# Altium PCB Power_Board-V1.0.PcbDoc (part 1 of 4)
Units mm, origin at the board's own origin, x right, y up, seen from the top; angles counter-clockwise.
Board outline 64.6 x 83.5 mm, 4 copper layers (Top Layer, GND1, GND2, Bottom Layer), stack 0.603 mm thick; 188 components, 131 nets, 487 pads, 123 vias.
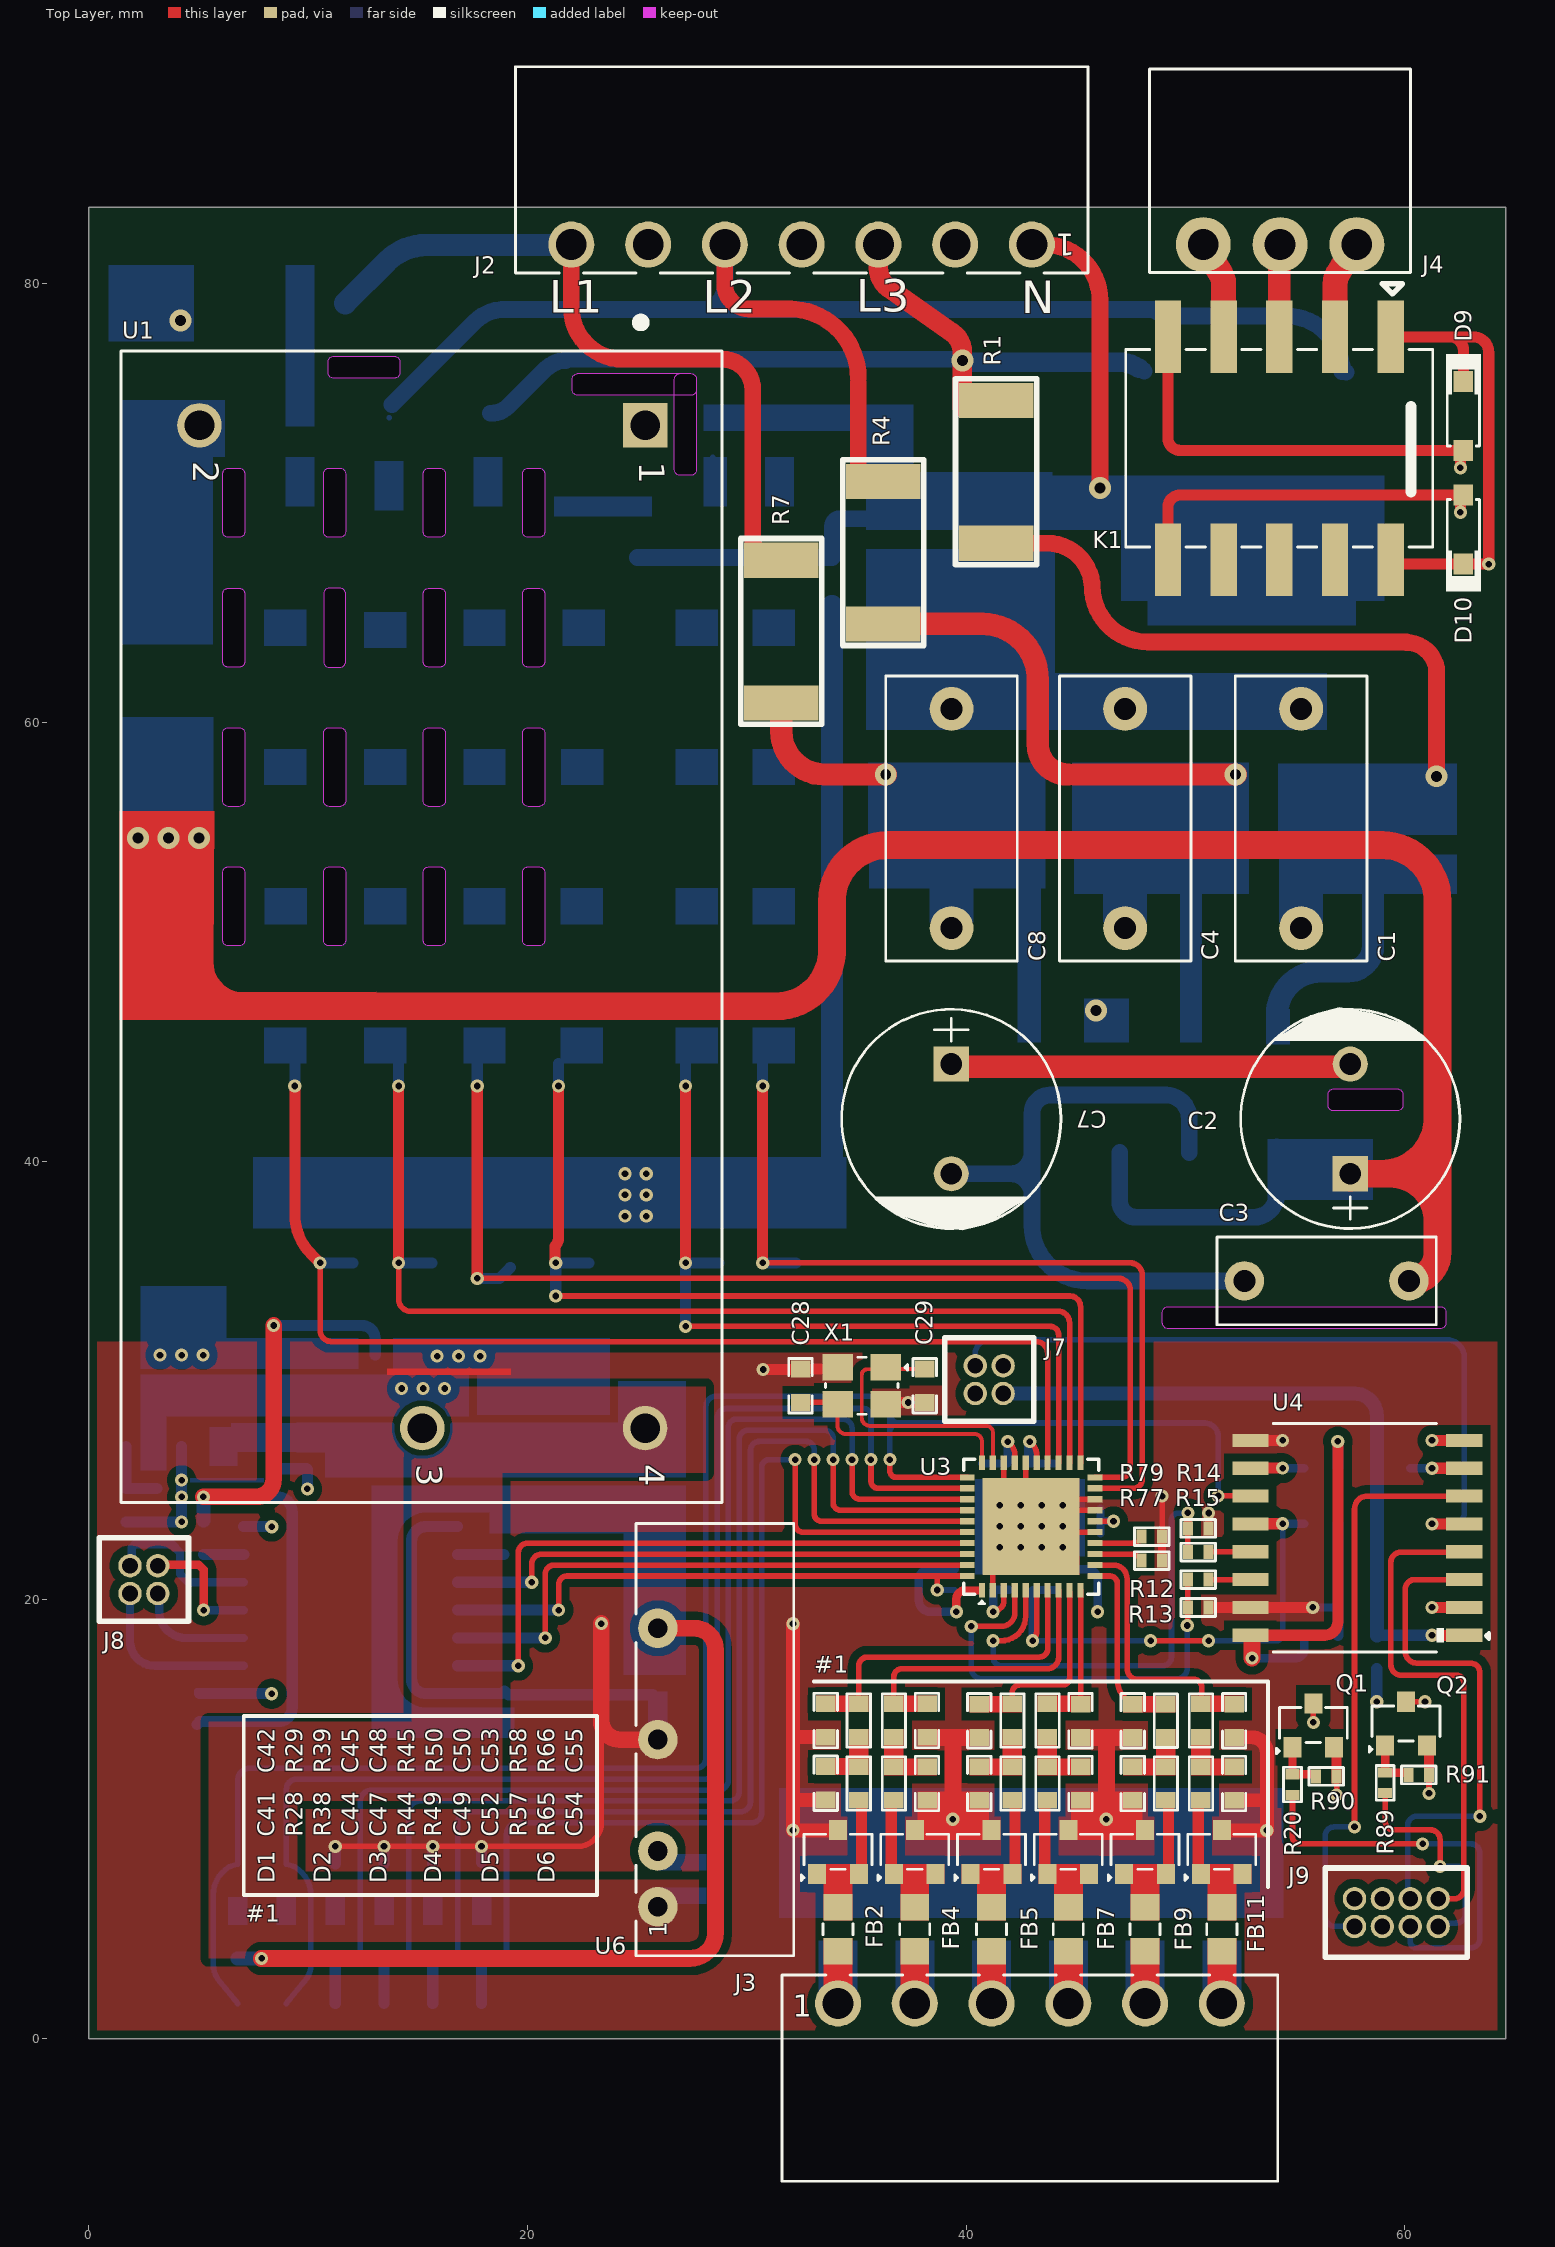
[diagram p0: Top Layer view]
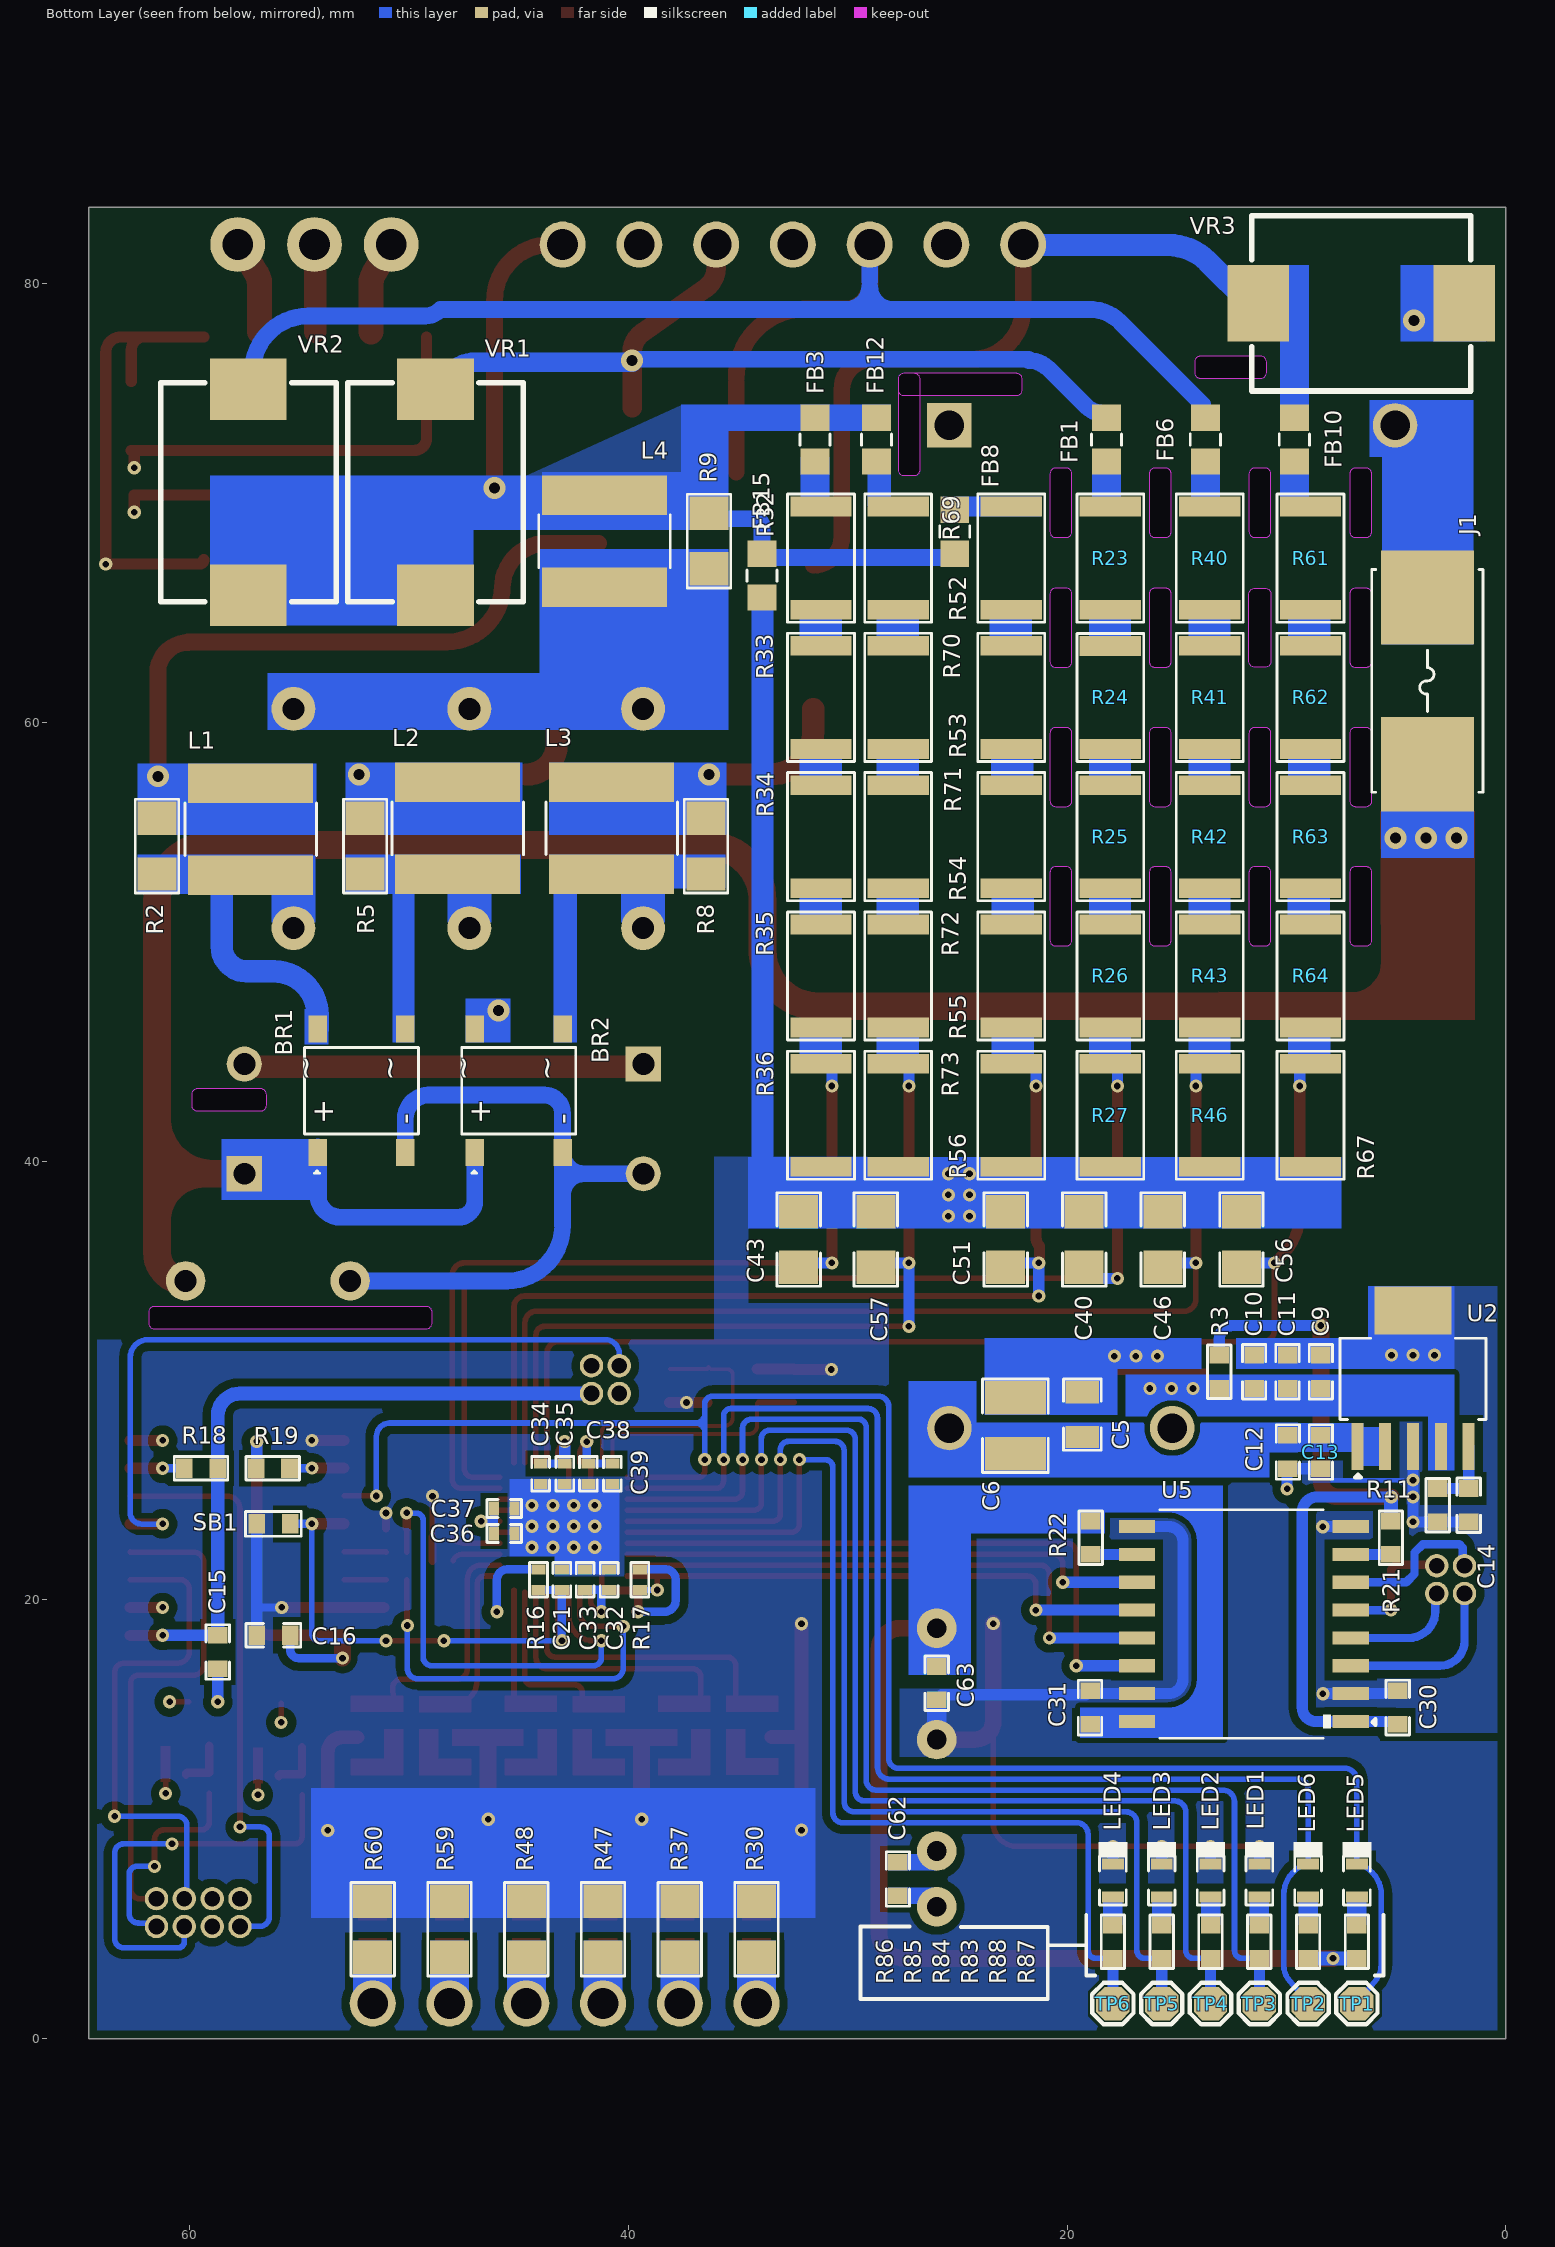
[diagram p1: Bottom Layer view, seen from below]
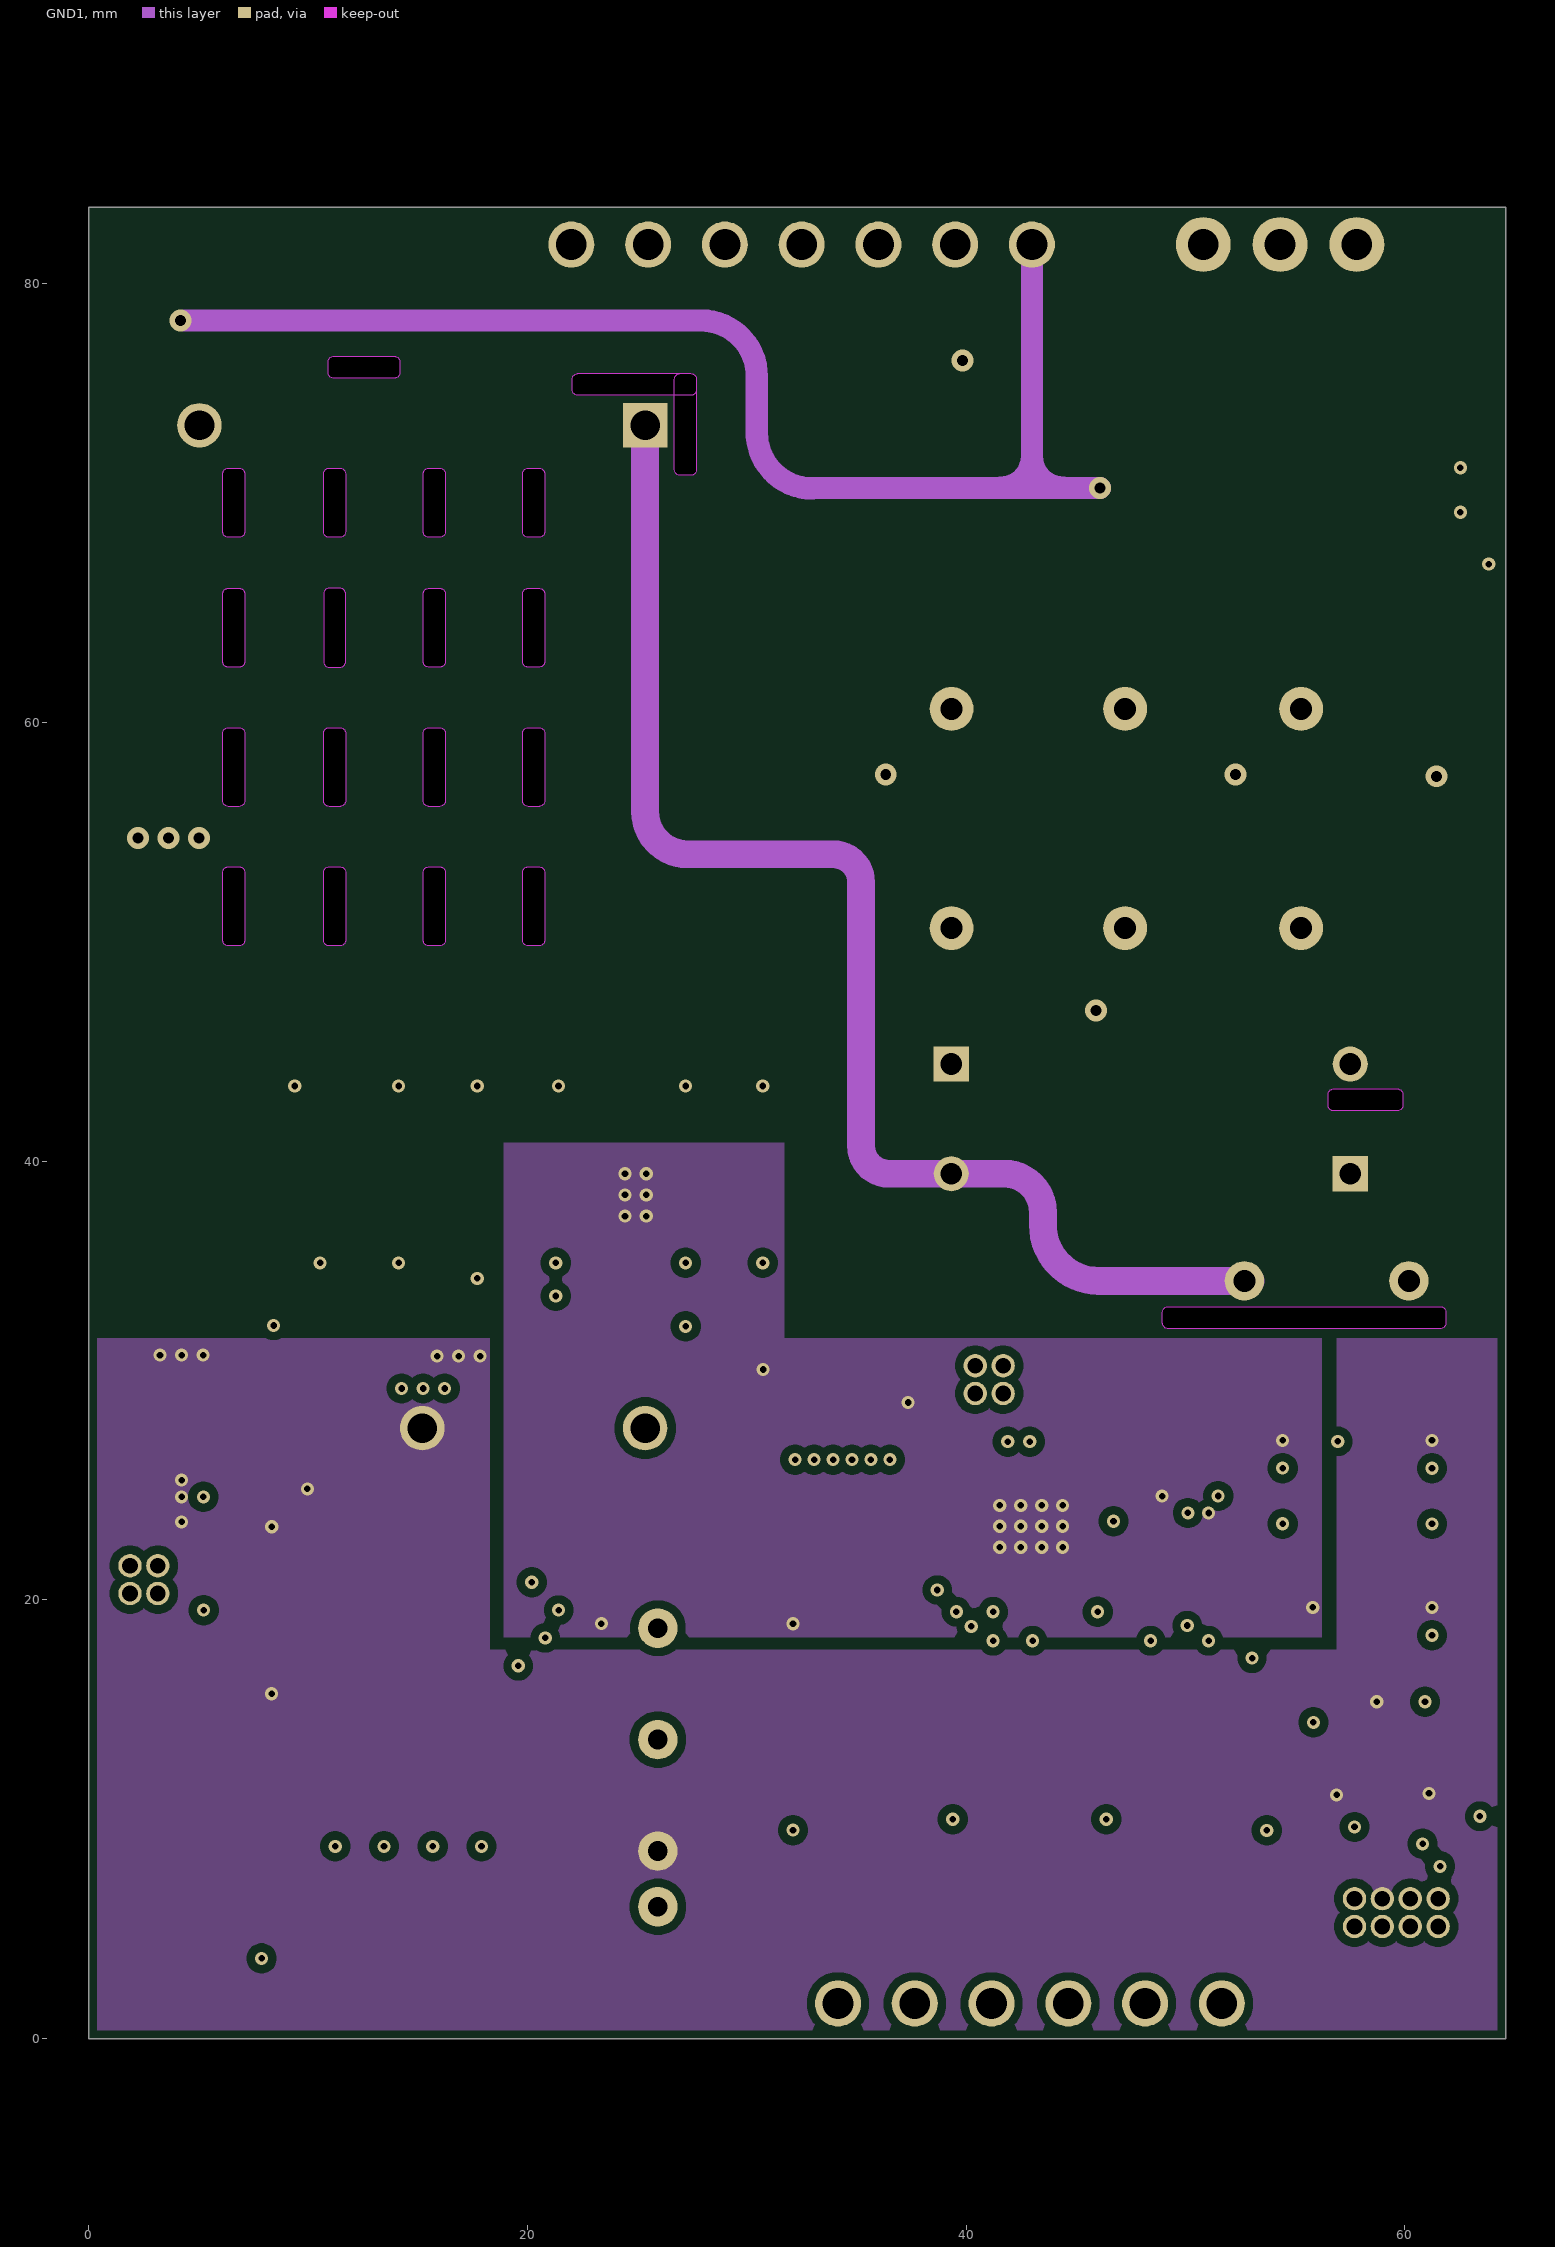
[diagram p2: GND1]
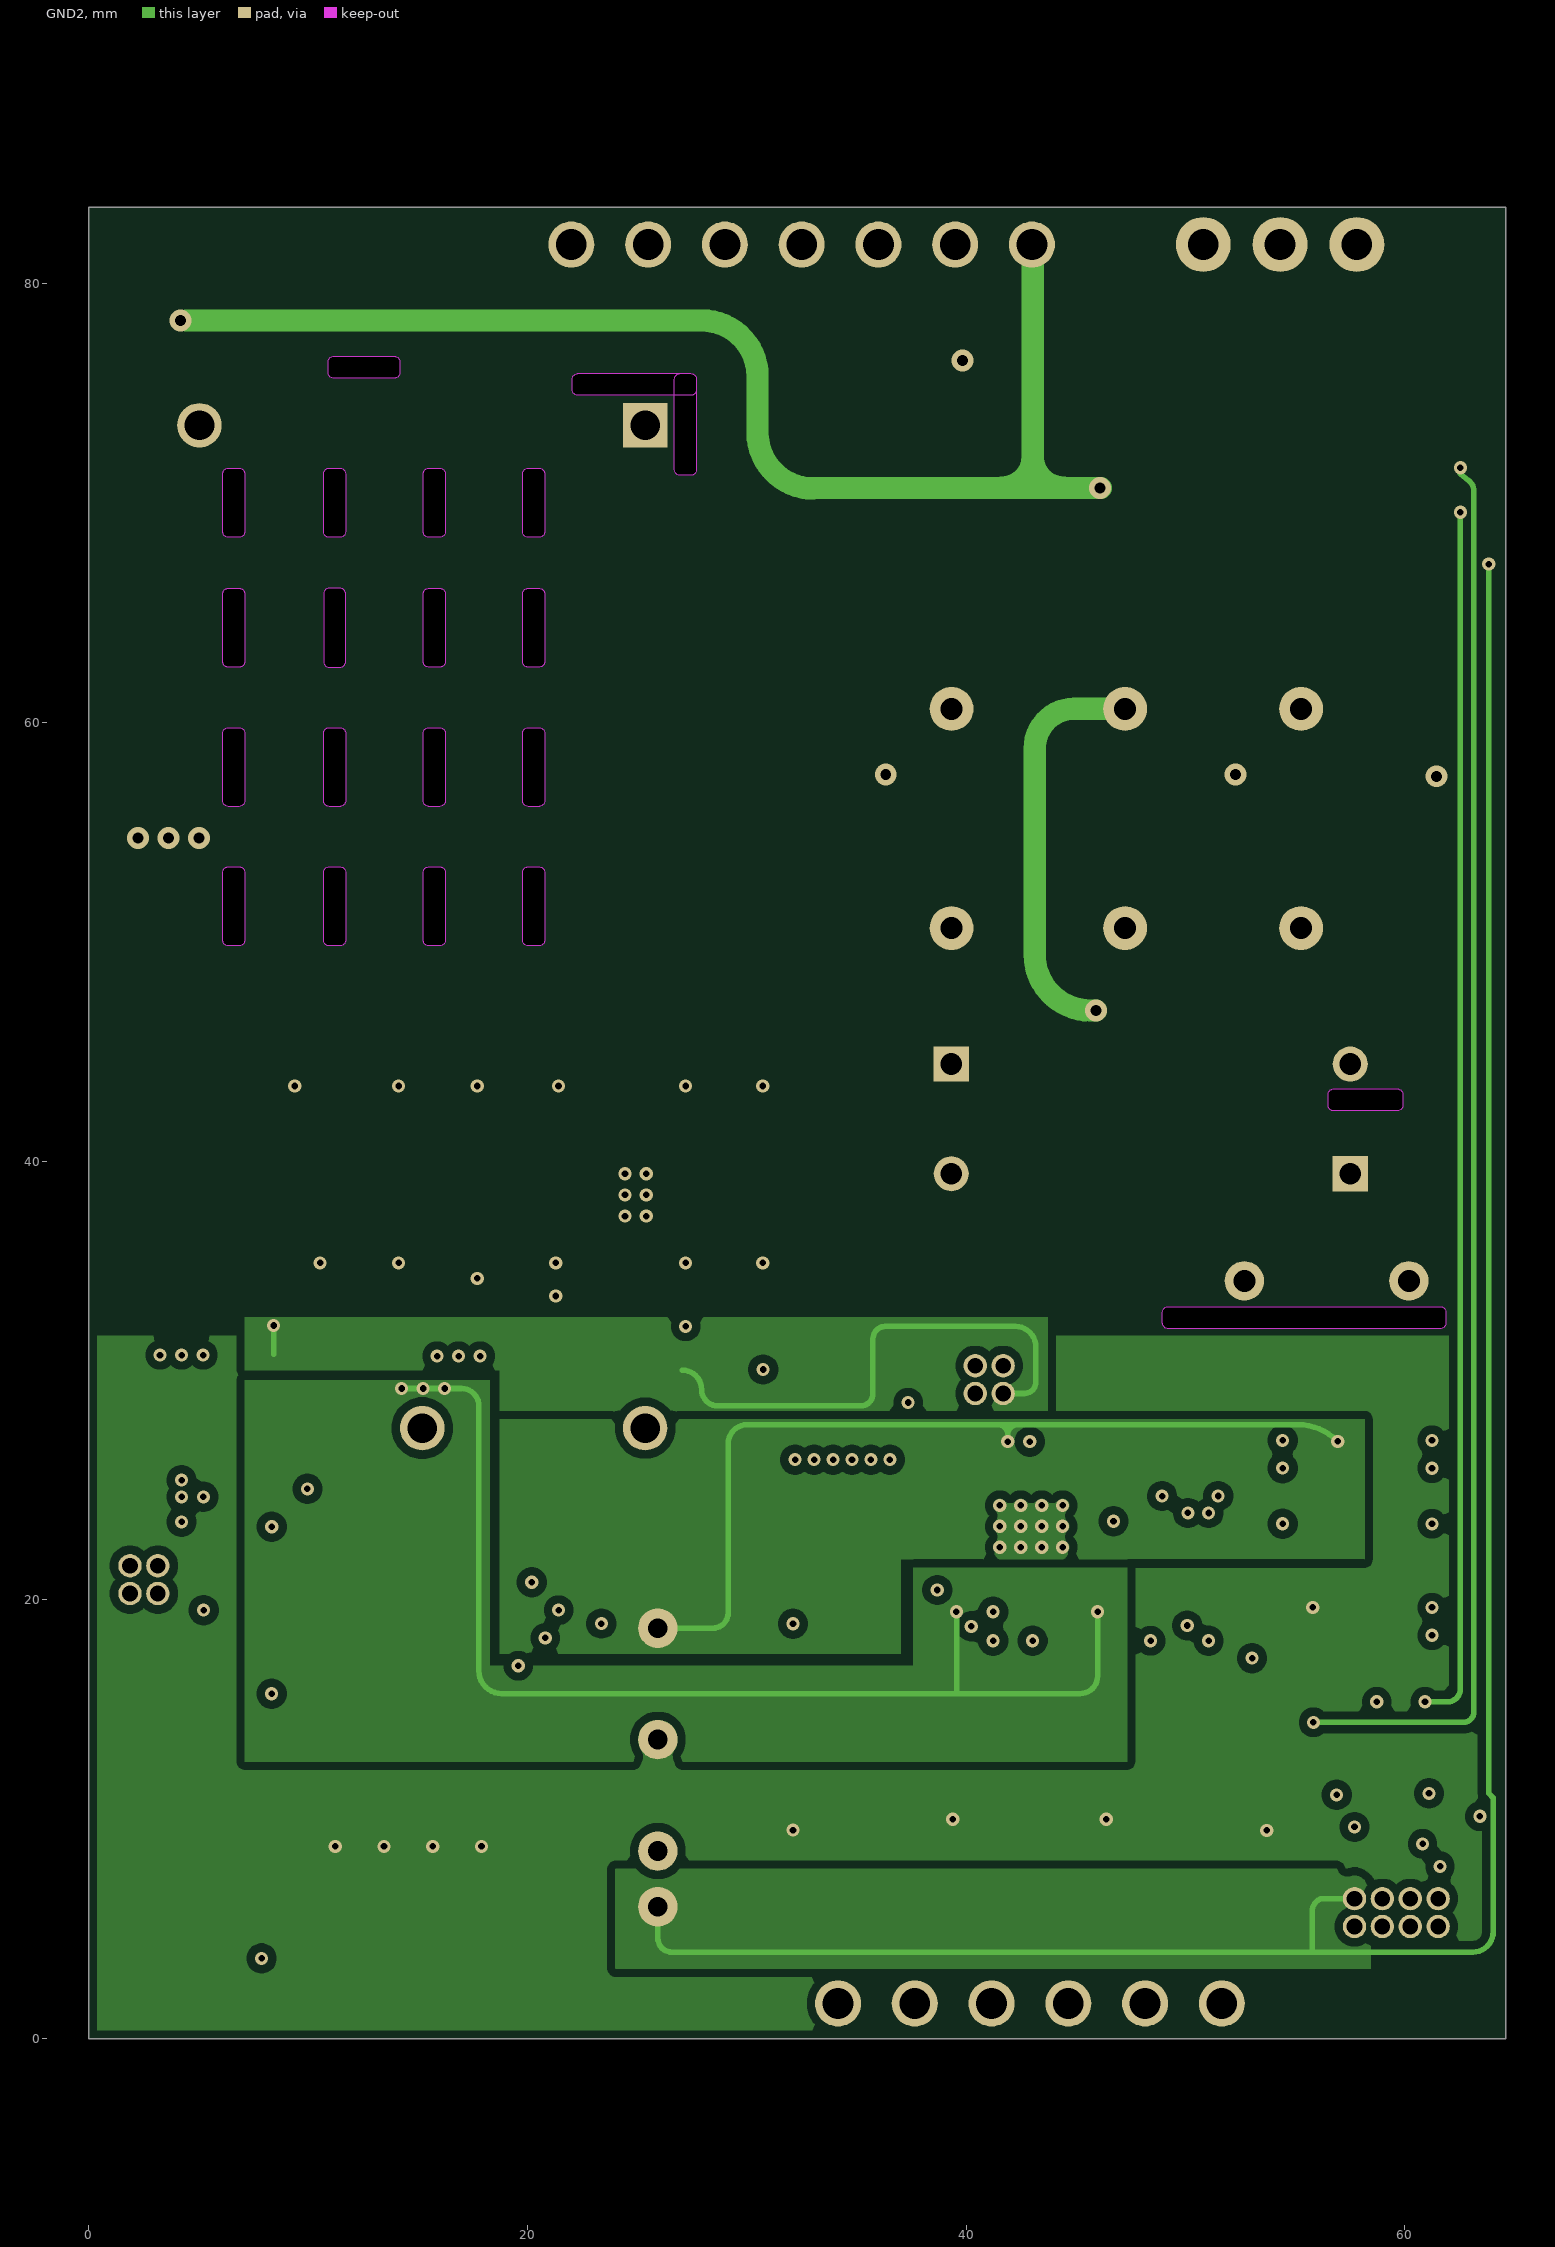
[diagram p3: GND2]
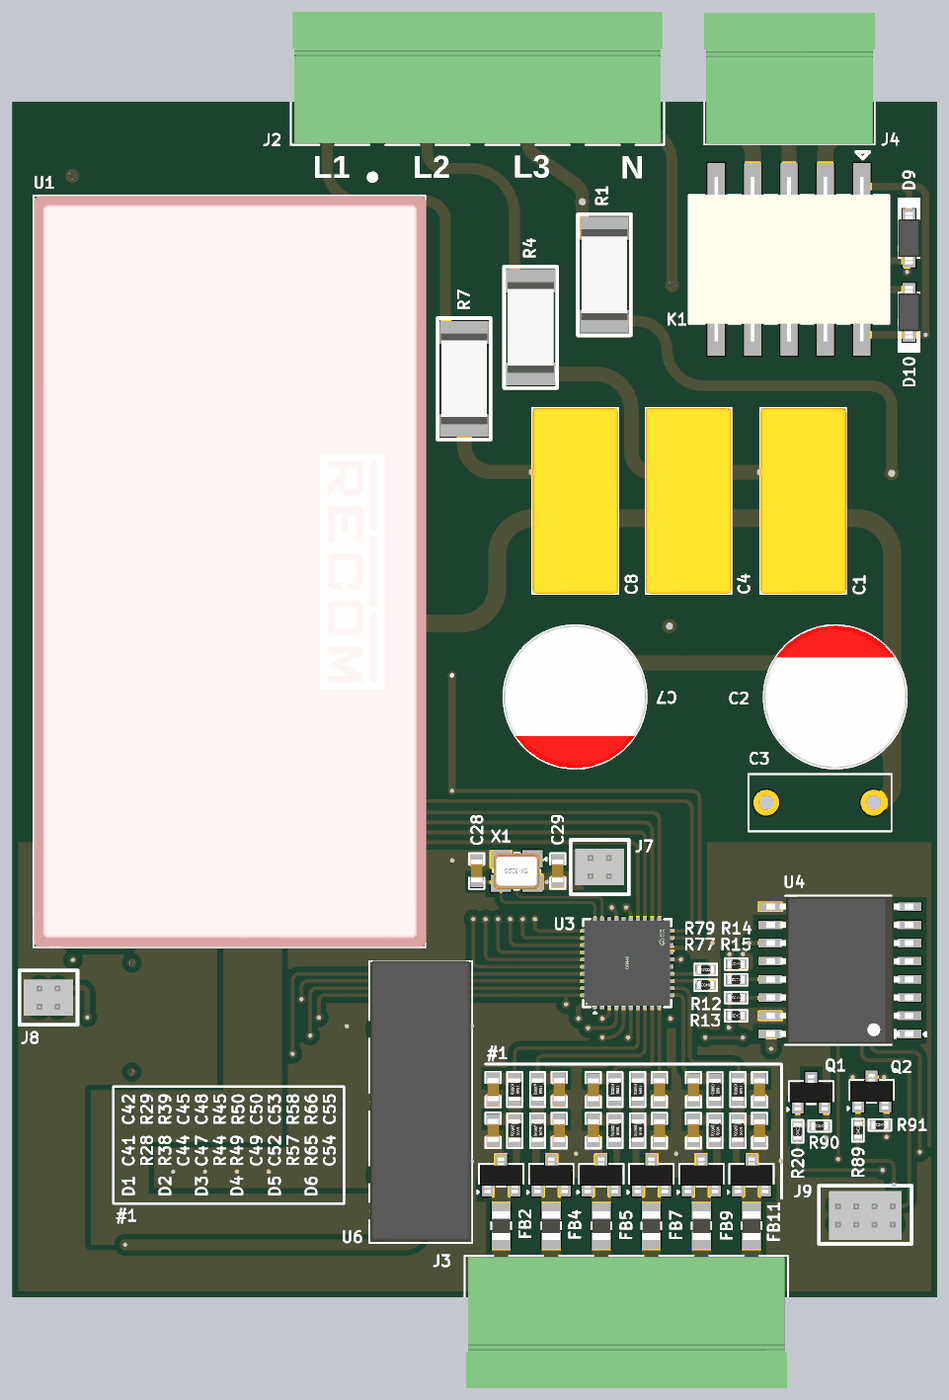
[diagram p5: 3D render of the assembled board from above, using the file's embedded part models]
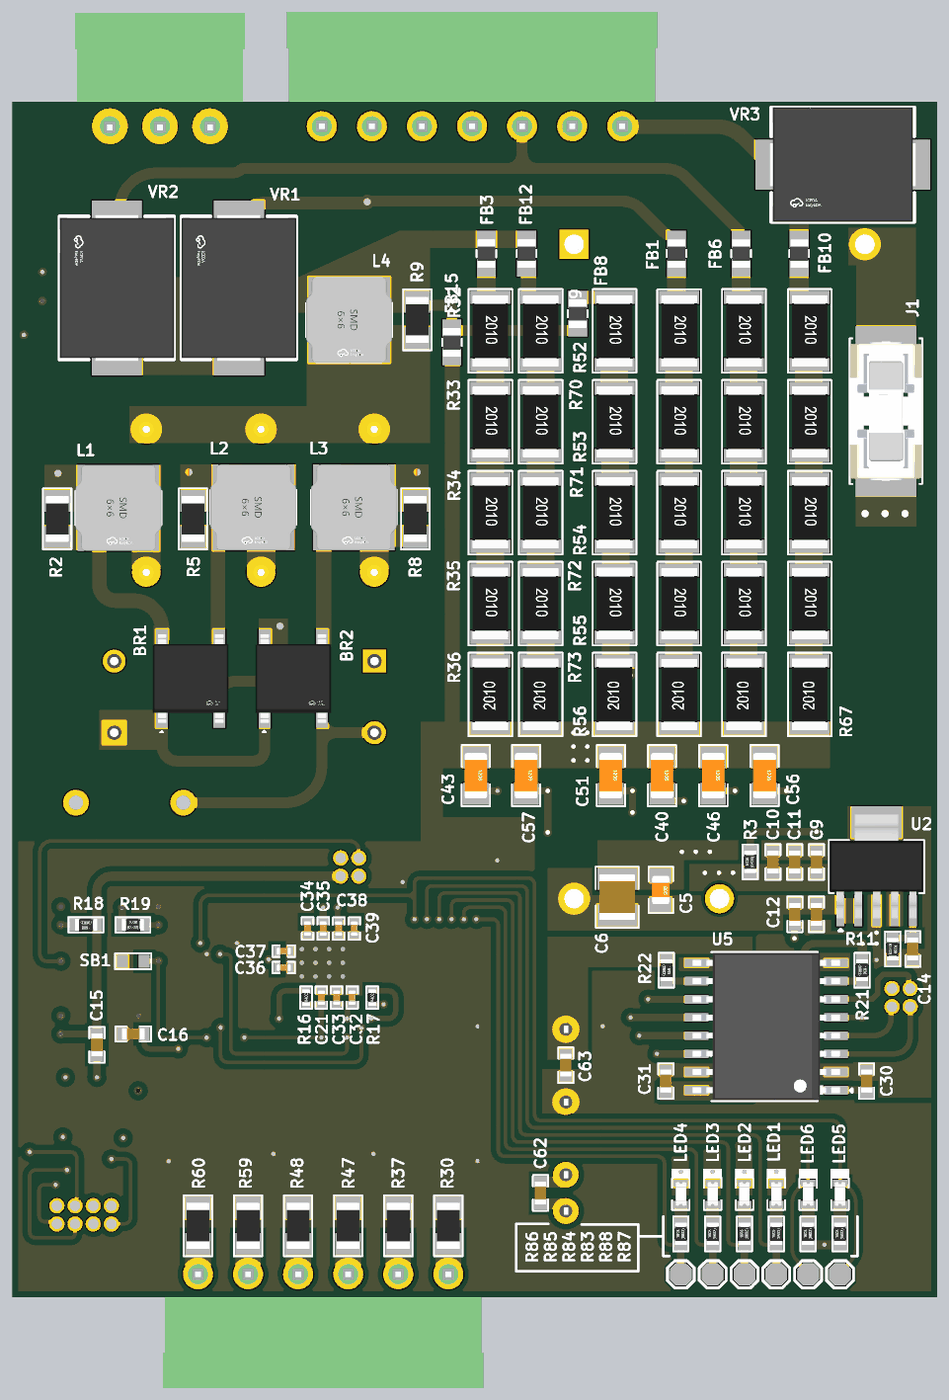
[diagram p6: 3D render of the assembled board from below, using the file's embedded part models]

## Layer stack, top to bottom
Top Solder: solder mask 0.0102, Solder Resist, Dk 3.5
Top Layer: signal copper 0.0356
Dielectric 2: prepreg 0.0711, PP-006, Dk 4.1
GND1: signal copper 0.035
Dielectric 1: dielectric 0.32, FR-4, Dk 4.8
GND2: signal copper 0.035
Dielectric 3: prepreg 0.0711, PP-006, Dk 4.1
Bottom Layer: signal copper 0.0356
Bottom Solder: solder mask 0.0102, Solder Resist, Dk 3.5

## Board outline
0,0 64.6,0 64.6,83.5 0,83.5
cut-out: 26.7,71.529 26.7,75.667 cw(c26.954,75.667) 26.954,75.921 27.446,75.921 cw(c27.446,75.667) 27.7,75.667 27.7,71.529 cw(c27.446,71.529) 27.446,71.275 26.954,71.275 cw(c26.954,71.529)
cut-out: 22.046,75.175 22.046,75.667 cw(c22.3,75.667) 22.3,75.921 27.446,75.921 cw(c27.446,75.667) 27.7,75.667 27.7,75.175 cw(c27.446,75.175) 27.446,74.921 22.3,74.921 cw(c22.3,75.175)
cut-out: 48.95,32.624 48.95,33.116 cw(c49.204,33.116) 49.204,33.37 61.621,33.37 cw(c61.621,33.116) 61.875,33.116 61.875,32.624 cw(c61.621,32.624) 61.621,32.37 49.204,32.37 cw(c49.204,32.624)
cut-out: 19.78,50.079 19.78,53.171 cw(c20.034,53.171) 20.034,53.425 20.526,53.425 cw(c20.526,53.171) 20.78,53.171 20.78,50.079 cw(c20.526,50.079) 20.526,49.825 20.034,49.825 cw(c20.034,50.079)
cut-out: 19.78,56.429 19.78,59.521 cw(c20.034,59.521) 20.034,59.775 20.526,59.775 cw(c20.526,59.521) 20.78,59.521 20.78,56.429 cw(c20.526,56.429) 20.526,56.175 20.034,56.175 cw(c20.034,56.429)
cut-out: 15.251,50.079 15.251,53.171 cw(c15.505,53.171) 15.505,53.425 15.997,53.425 cw(c15.997,53.171) 16.251,53.171 16.251,50.079 cw(c15.997,50.079) 15.997,49.825 15.505,49.825 cw(c15.505,50.079)
cut-out: 15.251,56.429 15.251,59.521 cw(c15.505,59.521) 15.505,59.775 15.997,59.775 cw(c15.997,59.521) 16.251,59.521 16.251,56.429 cw(c15.997,56.429) 15.997,56.175 15.505,56.175 cw(c15.505,56.429)
cut-out: 10.705,50.079 10.705,53.171 cw(c10.959,53.171) 10.959,53.425 11.451,53.425 cw(c11.451,53.171) 11.705,53.171 11.705,50.079 cw(c11.451,50.079) 11.451,49.825 10.959,49.825 cw(c10.959,50.079)
cut-out: 10.705,56.429 10.705,59.521 cw(c10.959,59.521) 10.959,59.775 11.451,59.775 cw(c11.451,59.521) 11.705,59.521 11.705,56.429 cw(c11.451,56.429) 11.451,56.175 10.959,56.175 cw(c10.959,56.429)
cut-out: 6.106,50.079 6.106,53.171 cw(c6.36,53.171) 6.36,53.425 6.852,53.425 cw(c6.852,53.171) 7.106,53.171 7.106,50.079 cw(c6.852,50.079) 6.852,49.825 6.36,49.825 cw(c6.36,50.079)
cut-out: 6.106,56.429 6.106,59.521 cw(c6.36,59.521) 6.36,59.775 6.852,59.775 cw(c6.852,59.521) 7.106,59.521 7.106,56.429 cw(c6.852,56.429) 6.852,56.175 6.36,56.175 cw(c6.36,56.429)
cut-out: 19.78,62.779 19.78,65.871 cw(c20.034,65.871) 20.034,66.125 20.526,66.125 cw(c20.526,65.871) 20.78,65.871 20.78,62.779 cw(c20.526,62.779) 20.526,62.525 20.034,62.525 cw(c20.034,62.779)
cut-out: 15.251,62.779 15.251,65.871 cw(c15.505,65.871) 15.505,66.125 15.997,66.125 cw(c15.997,65.871) 16.251,65.871 16.251,62.779 cw(c15.997,62.779) 15.997,62.525 15.505,62.525 cw(c15.505,62.779)
cut-out: 10.959,62.525 11.451,62.525 ccw(c11.451,62.779) 11.705,62.779 11.705,65.871 ccw(c11.451,65.871) 11.451,66.125 10.959,66.125 ccw(c10.959,65.871) 10.705,65.871 10.705,62.779 ccw(c10.959,62.779)
cut-out: 6.106,62.779 6.106,65.871 cw(c6.36,65.871) 6.36,66.125 6.852,66.125 cw(c6.852,65.871) 7.106,65.871 7.106,62.779 cw(c6.852,62.779) 6.852,62.525 6.36,62.525 cw(c6.36,62.779)
cut-out: 19.78,68.704 19.78,71.346 cw(c20.034,71.346) 20.034,71.6 20.526,71.6 cw(c20.526,71.346) 20.78,71.346 20.78,68.704 cw(c20.526,68.704) 20.526,68.45 20.034,68.45 cw(c20.034,68.704)
cut-out: 15.251,68.704 15.251,71.346 cw(c15.505,71.346) 15.505,71.6 15.997,71.6 cw(c15.997,71.346) 16.251,71.346 16.251,68.704 cw(c15.997,68.704) 15.997,68.45 15.505,68.45 cw(c15.505,68.704)
cut-out: 10.705,68.704 10.705,71.346 cw(c10.959,71.346) 10.959,71.6 11.451,71.6 cw(c11.451,71.346) 11.705,71.346 11.705,68.704 cw(c11.451,68.704) 11.451,68.45 10.959,68.45 cw(c10.959,68.704)
cut-out: 6.106,68.704 6.106,71.346 cw(c6.36,71.346) 6.36,71.6 6.852,71.6 cw(c6.852,71.346) 7.106,71.346 7.106,68.704 cw(c6.852,68.704) 6.852,68.45 6.36,68.45 cw(c6.36,68.704)
cut-out: 10.904,75.958 10.904,76.45 cw(c11.158,76.45) 11.158,76.704 13.925,76.704 cw(c13.925,76.45) 14.179,76.45 14.179,75.958 cw(c13.925,75.958) 13.925,75.704 11.158,75.704 cw(c11.158,75.958)
cut-out: 56.5,42.553 56.5,43.045 cw(c56.754,43.045) 56.754,43.299 59.656,43.299 cw(c59.656,43.045) 59.91,43.045 59.91,42.553 cw(c59.656,42.553) 59.656,42.299 56.754,42.299 cw(c56.754,42.553)

## Design rules (kind name [scope] priority, off if disabled: settings)
BoardOutlineClearance [All] p1: gap=0 ignorepadtopadclearanceinfootprint=FALSE except(0.381: Poly-OutlineEdge)
Clearance [All] p1: gap=0.254 ignorepadtopadclearanceinfootprint=FALSE except(0.152: THPad-THPad; 0.178: Arc-Arc Arc-Track Arc-SMDPad Arc-Via Track-Track Track-SMDPad Track-Via SMDPad-SMDPad SMDPad-Via; 0.381: Arc-Poly Track-Poly SMDPad-Poly THPad-Poly Via-Poly Fill-Poly Poly-Poly)
Clearance Clearance_HV_AC [InNetClass('HV_IN') vs InNetClass('HV_IN')] p2: gap=1.5 ignorepadtopadclearanceinfootprint=FALSE except(0.254: Arc-Fill Arc-Region Arc-Text Track-Fill Track-Region Track-Text SMDPad-Fill SMDPad-Region SMDPad-Text THPad-Fill THPad-Region THPad-Text Via-Fill Via-Region Via-Text Fill-Fill Fill-Region Fill-Text Poly-Region Poly-Text Region-Region Region-Text Text-Text Text-Hole) // High-voltage clearance
ComponentClearance [All] p1: gap=0 collisioncheckmode=3 verticalgap=0 showdistances=FALSE
Height [All] p1: minheight=0 maxheight=100 prefheight=0
MinimumSolderMaskSliver [All] p1: minsoldermaskwidth=0
PolygonConnect [All] p1: connectstyle=Direct reliefconductorwidth=0.254 reliefentries=4 polygonreliefangle="90 Angle" airgapwidth=0.254
RoutingVias [All] p1: holewidth=0.3 width=0.6 viastyle="Through Hole" minholewidth=0.3 minwidth=0.6 maxholewidth=0.5 maxwidth=1
SilkToSilkClearance [All] p1: silktosilkclearance=0
SilkToSolderMaskClearance [IsPad] p1: minsilkscreentomaskgap=0 clearancetoexposedcopper=TRUE
SolderMaskExpansion [All] p1: expansion=0.102 istentingtop=FALSE
SupplyNets "Schematic Supply Nets_25" [InNet('ICN')] p1: voltage=0.000
SupplyNets "Schematic Supply Nets_24" [InNet('VB_N')] p2: voltage=0.000
SupplyNets "Schematic Supply Nets_23" [InNet('VC_N')] p3: voltage=0.000
SupplyNets "Schematic Supply Nets_22" [InNet('DVDD')] p4: voltage=0.000
SupplyNets "Schematic Supply Nets_21" [InNet('VA_N')] p5: voltage=0.000
SupplyNets "Schematic Supply Nets_20" [InNet('VA_P')] p6: voltage=0.000
SupplyNets "Schematic Supply Nets_19" [InNet('GND')] p7: voltage=0.000
SupplyNets "Schematic Supply Nets_18" [InNet('5VDC')] p8: voltage=0.000
SupplyNets "Schematic Supply Nets_17" [InNet('IAN')] p9: voltage=0.000
SupplyNets "Schematic Supply Nets_16" [InNet('IBN')] p10: voltage=0.000
SupplyNets "Schematic Supply Nets_15" [InNet('VB_P')] p11: voltage=0.000
SupplyNets "Schematic Supply Nets_14" [InNet('ICP')] p12: voltage=0.000
SupplyNets "Schematic Supply Nets_13" [InNet('INP')] p13: voltage=0.000
SupplyNets "Schematic Supply Nets_12" [InNet('HVGND')] p14: voltage=0.000
SupplyNets "Schematic Supply Nets_11" [InNet('VC_P')] p15: voltage=0.000
SupplyNets "Schematic Supply Nets_10" [InNet('IAP')] p16: voltage=0.000
SupplyNets "Schematic Supply Nets_9" [InNet('IBP')] p17: voltage=0.000
SupplyNets "Schematic Supply Nets_8" [InNet('AVDD')] p18: voltage=0.000
SupplyNets "Schematic Supply Nets_7" [InNet('AD_GND')] p19: voltage=0.000
SupplyNets "Schematic Supply Nets_5" [InNet('REF')] p20: voltage=0.000
SupplyNets "Schematic Supply Nets_4" [InNet('3V3-ISO')] p21: voltage=0.000
SupplyNets "Schematic Supply Nets_3" [InNet('+3V3')] p22: voltage=0.000
SupplyNets "Schematic Supply Nets_1" [InNet('3V3DC')] p23: voltage=0.000
SupplyNets "Schematic Supply Nets" [InNet('INN')] p24: voltage=0.000
Width [All] p1: maxlimit=1.27 minlimit=0.178 preferedwidth=0.254 midlayer1_minwidth=0.254 midlayer2_minwidth=0.254 minimp=50.000000 maximp=50.000000 favimp=50.000000
25 further rules are at their usual default settings.

## Classes and differential pairs
net class HV_IN: NEUTRAL VA_INPUT VB_INPUT VC_INPUT
net class HV_DC: HV_DC HVGND
component class Power_Supply_Sheet: BR1 BR2 C1 C2 C3 C4 C5 C6 C7 C8 C9 C10 C11 C12 C13 C14 C62 C63 J1 L1 L2 L3 L4 R1 R2 R3 R4 R5 R7 R8 R9 R11 U1 U2 U6
component class Metering_Sheet: C15 C16 C21 C28 C29 C30 C31 C32 C33 C34 C35 C36 C37 C38 C39 LED1 LED2 LED3 LED4 LED5 LED6 R12 R13 R14 R15 R16 R17 R18 R19 R21 R22 R83 R84 R85 R86 R87 R88 SB1 TP1 TP2 TP3 TP4 TP5 TP6 U3 U4 U5 X1
component class Interface_Sheet: C40 C41 C42 C43 C44 C45 C46 C47 C48 C49 C50 C51 C52 C53 C54 C55 C56 C57 D1 D2 D3 D4 D5 D6 FB1 FB2 FB3 FB4 FB5 FB6 FB7 FB8 FB9 FB10 FB11 FB12 FB15 R23 R24 R25 R26 R27 R28 R29 R30 R32 R33 R34 R35 R36 R37 R38 R39 R40 R41 R42 R43 R44 R45 R46 R47 R48 R49 R50 R52 R53 R54 R55 R56 R57 R58 R59 R60 R61 R62 R63 R64 R65 R66 R67 R69 R70 R71 R72 R73 R77 R79 VR1 VR2 VR3
component class Connector_Sheet: D9 D10 J2 J3 J4 J7 J8 J9 K1 Q1 Q2 R20 R89 R90 R91

## Components (designator, comment, footprint, x,y, rotation, side; value= is the part's Value field where it differs from the comment)
BR1 "LMB8S-TP" LMBS-1 52.168,43.216 r90 bottom locked
BR2 "LMB8S-TP" LMBS-1 45,43.216 r90 bottom locked
C1 "0.1uF" B32921C3104M000 55.27,55.63 r270 top value=100nF
C2 "33uF" 87EC0494 57.513,41.933 r90 top
C3 "10nF" MPBH103J3A0701 56.438,34.544 r0 top
C4 "0.1uF" B32921C3104M000 47.25,55.63 r270 top value=100nF
C5 "0.1uF" Cap-0805 19.304,28.448 r270 bottom value=100nF
C6 "10uF" Cap-1210 22.352,27.94 r270 bottom
C7 "33uF" 87EC0494 39.321,41.933 r270 top
C8 "0.1uF" B32921C3104M000 39.334,55.63 r270 top value=100nF
C9 "100nF" Cap-0603 8.424,30.404 r270 bottom
C10 "4.7uF" Cap-0603 11.472,30.404 r270 bottom
C11 "4.7uF" Cap-0603 9.948,30.404 r270 bottom
C12 "4.7uF" Cap-0603 9.931,26.743 r90 bottom
C13 "100nF" Cap-0603 8.424,26.744 r90 bottom
C14 "0.01uF" Cap-0603 1.686,24.319 r90 bottom
C15 "0.1uF" Cap-0603 58.724,17.625 r90 bottom value=100nF
C16 "0.1uF" Cap-0603 56.184,18.387 r180 bottom value=100nF
C21 "1uF" Cap-0402 43.037,20.924 r270 bottom
C28 "15pF" Cap-0603 32.447,29.766 r270 top
C29 "15pF" Cap-0603 38.114,29.766 r90 top
C30 "0.1uF" Cap-0603 4.92,15.092 r270 bottom value=100nF
C31 "0.1uF" Cap-0603 18.953,15.092 r270 bottom value=100nF
C32 "100nF" Cap-0402 40.877,20.924 r270 bottom
C33 "4.7uF" Cap-0402 41.97,20.924 r270 bottom
C34 "100nF" Cap-0402 43.997,25.753 r90 bottom
C35 "4.7uF" Cap-0402 42.9,25.753 r90 bottom
C36 "100nF" Cap-0402 45.657,23.027 r0 bottom
C37 "4.7uF" Cap-0402 45.66,24.17 r0 bottom
C38 "100nF" Cap-0402 41.829,25.749 r90 bottom
C39 "4.7uF" Cap-0402 40.732,25.749 r90 bottom
C40 "22nF" Cap-1206 19.216,36.434 r270 bottom
C41 "22nF" Cap-0603 33.598,11.643 r90 top
C42 "22nF" Cap-0603 33.598,14.501 r90 top
C43 "22nF" Cap-1206 32.233,36.434 r270 bottom
C44 "22nF" Cap-0603 38.216,11.63 r270 top
C45 "22nF" Cap-0603 38.216,14.5 r270 top
C46 "22nF" Cap-1206 15.634,36.436 r270 bottom
C47 "22nF" Cap-0603 40.598,11.631 r90 top
C48 "22nF" Cap-0603 40.598,14.488 r90 top
C49 "22nF" Cap-0603 45.216,11.63 r270 top
C50 "22nF" Cap-0603 45.216,14.487 r270 top
C51 "22nF" Cap-1206 22.797,36.436 r270 bottom
C52 "22nF" Cap-0603 47.598,11.63 r90 top
C53 "22nF" Cap-0603 47.598,14.487 r90 top
C54 "22nF" Cap-0603 52.216,11.63 r270 top
C55 "22nF" Cap-0603 52.216,14.487 r270 top
C56 "22nF" Cap-1206 12.051,36.435 r270 bottom
C57 "22nF" Cap-1206 28.718,36.435 r270 bottom
C62 "10uF" Cap-0603 27.711,7.277 r270 bottom
C63 "4.7uF" Cap-0603 25.944,16.205 r90 bottom
D1 "BAV99,215" SOT-23 34.157,8.506 r0 top value=1.5pF
D2 "BAV99,215" SOT-23 37.657,8.506 r0 top value=1.5pF
D3 "BAV99,215" SOT-23 41.157,8.506 r0 top value=1.5pF
D4 "BAV99,215" SOT-23 44.657,8.506 r0 top value=1.5pF
D5 "BAV99,215" SOT-23 48.157,8.506 r0 top value=1.5pF
D6 "BAV99,215" SOT-23 51.657,8.506 r0 top value=1.5pF
D9 "1N5819HW-7-F" SOD-123 62.67,73.985 r90 top
D10 "1N5819HW-7-F" SOD-123 62.67,68.804 r270 top
FB1 "BLM21BD152SN1D" Ind-0805 18.2,72.903 r270 bottom
FB2 "BLM21BD152SN1D" Ind-0805 34.157,4.985 r90 top
FB3 "BLM21BD152SN1D" Ind-0805 31.496,72.904 r270 bottom
FB4 "BLM21BD152SN1D" Ind-0805 37.657,4.985 r90 top
FB5 "BLM21BD152SN1D" Ind-0805 41.157,4.985 r90 top
FB6 "BLM21BD152SN1D" Ind-0805 13.693,72.903 r270 bottom
FB7 "BLM21BD152SN1D" Ind-0805 44.657,4.985 r90 top
FB8 "BLM21BD152SN1D" Ind-0805 25.119,68.707 r90 bottom
FB9 "BLM21BD152SN1D" Ind-0805 48.157,4.985 r90 top
FB10 "BLM21BD152SN1D" Ind-0805 9.635,72.903 r270 bottom
FB11 "BLM21BD152SN1D" Ind-0805 51.657,4.985 r90 top
FB12 "BLM21BD152SN1D" Ind-0805 28.689,72.904 r270 bottom
FB15 "BLM21BD152SN1D" Ind-0805 33.908,66.703 r270 bottom
J1 "01550900M" 01550900M 3.569,61.902 r270 bottom
J2 "691322110007" 691322110007 32.5,81.8 r180 top locked
J3 "691322110006" 691322110006 42.907,1.6 r0 top locked
J4 "691322110003" 691322110003 54.314,81.8 r180 top locked
J7 "SFMC-102-X1-XX-D" "SFMC-102-X1-XX-D - 570" 41.049,30.046 r90 top
J8 "SFMC-102-X1-XX-D" "SFMC-102-X1-XX-D - 570" 2.511,20.927 r270 top
J9 "SFMC-104-X1-XX-D" "SFMC-104-X1-XX-D - 570" 59.613,5.746 r180 top
K1 "TQ2SA-L2-5V-Z" TQ2SA-L2-5V-Z 54.279,72.51 r270 top
L1 "470uH" XRNR6045-470uH/M 57.221,55.139 r270 bottom
L2 "470uH" XRNR6045-470uH/M 47.783,55.181 r270 bottom
L3 "470uH" XRNR6045-470uH/M 40.76,55.182 r270 bottom
L4 "470uH" XRNR6045-470uH/M 41.091,68.278 r270 bottom
LED1 "Emerald" LED-0603 11.233,7.211 r90 bottom
LED2 "Emerald" LED-0603 13.458,7.211 r90 bottom
LED3 "Emerald" LED-0603 15.683,7.211 r90 bottom
LED4 "Emerald" LED-0603 17.908,7.211 r90 bottom
LED5 "Emerald" LED-0603 6.783,7.211 r90 bottom
LED6 "Emerald" LED-0603 9.008,7.211 r90 bottom
Q1 "DMG3420UQ-7" SOT-23 55.83,14.281 r0 top
Q2 "DMG3420UQ-7" SOT-23 60.054,14.357 r0 top
R1 "1R" RES-2512 41.368,71.429 r270 top
R2 "10K" Res-1206 61.493,54.369 r270 bottom value=10kR
R3 "0R" Res-0603 13.059,30.404 r270 bottom
R4 "1R" RES-2512 36.22,67.753 r270 top
R5 "10K" Res-1206 52.005,54.369 r270 bottom value=10kR
R7 "1R" RES-2512 31.571,64.153 r270 top
R8 "10K" Res-1206 36.461,54.369 r270 bottom value=10kR
R9 "10K" Res-1206 36.328,68.278 r270 bottom value=10kR
R11 "DNP" Res-0603 3.098,24.319 r90 bottom
R12 "0R" Res-0402 50.582,20.924 r180 top
R13 "DNP" Res-0402 50.582,19.657 r180 top
R14 "DNP" Res-0402 50.582,23.264 r180 top
R15 "0R" Res-0402 50.582,22.178 r180 top
R16 "10K" Res-0402 44.101,20.924 r90 bottom
R17 "DNP" Res-0402 39.474,20.924 r90 bottom
R18 "4.7K" Res-0603 59.486,26.007 r180 bottom
R19 "4.7K" Res-0603 56.209,26.007 r0 bottom
R20 "1K" Res-0402 54.88,11.582 r90 top
R21 "4.7K" Res-0603 5.232,22.839 r90 bottom
R22 "4.7K" Res-0603 18.923,22.839 r90 bottom
R23 "200K" RES-2010 18.026,67.499 r270 bottom
R24 "200K" RES-2010 18.026,61.149 r270 bottom
R25 "200K" RES-2010 18.025,54.799 r270 bottom
R26 "200K" RES-2010 18.025,48.449 r270 bottom
R27 "1K" RES-2010 18.025,42.099 r90 bottom
R28 "0R" Res-0603 35.107,11.63 r90 top
R29 "1K" Res-0603 35.107,14.501 r90 top
R30 "5.1R" Res-1206 34.157,4.985 r270 bottom
R32 "200K" RES-2010 31.217,67.5 r270 bottom
R33 "200K" RES-2010 31.217,61.15 r270 bottom
R34 "200K" RES-2010 31.217,54.8 r270 bottom
R35 "200K" RES-2010 31.217,48.45 r270 bottom
R36 "1K" RES-2010 31.217,42.099 r90 bottom
R37 "5.1R" Res-1206 37.657,4.985 r90 bottom
R38 "0R" Res-0603 36.707,11.63 r90 top
R39 "1K" Res-0603 36.707,14.501 r90 top
R40 "200K" RES-2010 13.493,67.5 r270 bottom
R41 "200K" RES-2010 13.493,61.15 r270 bottom
R42 "200K" RES-2010 13.493,54.8 r270 bottom
R43 "200K" RES-2010 13.493,48.45 r270 bottom
R44 "0R" Res-0603 42.107,11.63 r90 top
R45 "1K" Res-0603 42.107,14.501 r90 top
R46 "1K" RES-2010 13.493,42.099 r90 bottom
R47 "5.1R" Res-1206 41.157,4.985 r270 bottom
R48 "5.1R" Res-1206 44.657,4.985 r90 bottom
R49 "0R" Res-0603 43.707,11.63 r90 top
R50 "1K" Res-0603 43.707,14.501 r90 top
R52 "200K" RES-2010 22.543,67.5 r270 bottom
R53 "200K" RES-2010 22.543,61.15 r270 bottom
R54 "200K" RES-2010 22.543,54.8 r270 bottom
R55 "200K" RES-2010 22.543,48.45 r270 bottom
R56 "1K" RES-2010 22.543,42.099 r90 bottom
R57 "0R" Res-0603 49.107,11.63 r90 top
R58 "1K" Res-0603 49.107,14.488 r90 top
R59 "5.1R" Res-1206 48.157,4.985 r270 bottom
R60 "5.1R" Res-1206 51.657,4.985 r90 bottom
R61 "200K" RES-2010 8.899,67.5 r270 bottom
R62 "200K" RES-2010 8.899,61.15 r270 bottom
R63 "200K" RES-2010 8.899,54.8 r270 bottom
R64 "200K" RES-2010 8.899,48.45 r270 bottom
R65 "0R" Res-0603 50.707,11.63 r90 top
R66 "1K" Res-0603 50.707,14.501 r90 top
R67 "1K" RES-2010 8.899,42.099 r90 bottom
R69 "200K" RES-2010 27.702,67.5 r270 bottom
R70 "200K" RES-2010 27.702,61.15 r270 bottom
R71 "200K" RES-2010 27.702,54.8 r270 bottom
R72 "200K" RES-2010 27.702,48.45 r270 bottom
R73 "1K" RES-2010 27.702,42.1 r90 bottom
R77 "0R" Res-0402 48.462,21.79 r180 top
R79 "0R" Res-0402 48.462,22.888 r0 top
R83 "680R" Res-0603 11.233,4.417 r270 bottom
R84 "680R" Res-0603 13.458,4.417 r270 bottom
R85 "680R" Res-0603 15.683,4.417 r270 bottom
R86 "680R" Res-0603 17.908,4.417 r270 bottom
R87 "680R" Res-0603 6.783,4.417 r270 bottom
R88 "680R" Res-0603 9.008,4.417 r270 bottom
R89 "1K" Res-0402 59.104,11.659 r90 top
R90 "100K" Res-0402 56.42,11.956 r180 top
R91 "100K" Res-0402 60.632,12.024 r180 top
SB1 "Solder Bridge 0603" "Solder Bridge" 56.184,23.467 r180 bottom
TP1 "TEST POINT" Test-point 6.783,1.597 r180 bottom
TP2 "TEST POINT" Test-point 9.008,1.597 r180 bottom
TP3 "TEST POINT" Test-point 11.233,1.597 r180 bottom
TP4 "TEST POINT" Test-point 13.458,1.597 r180 bottom
TP5 "TEST POINT" Test-point 15.683,1.597 r180 bottom
TP6 "TEST POINT" Test-point 17.908,1.597 r180 bottom
U1 "RAC05-05SK/480" RAC05-05SK/480 15.204,50.696 r270 top locked
U2 "TPS79633DCQR" SOT-223-6_ 4.226,30.096 r180 bottom
U3 "ADE9000ACPZ" "40-LFCSP-WQ (6x6)" 42.966,23.34 r90 top
U4 "ISO7741DWR" SOIC-16-300mil 57.835,22.832 r180 top
U5 "ISO7741DWR" SOIC-16-300mil 11.936,18.902 r0 bottom
U6 "B0503S-2WR3" B0503S-2WR3 25.944,12.361 r90 top
VR1 "20D431K" 4032 48.793,70.503 r90 bottom
VR2 "20D431K" 4032 57.328,70.503 r90 bottom
VR3 "20D431K" 4032 6.585,79.121 r0 bottom
X1 "24.576MHz" SMD3225-4P 35.24,29.766 r180 top

## Footprints (in the part's own frame and the unit in brackets; to place one, negate y for a bottom-side part, rotate by r counter-clockwise, add the part's x,y. Pads: shape width x height; smd on the part's side, far side on the other; paste and mask are expansions set on the pad)
"40-LFCSP-WQ (6x6)" [mm]
  rect 0.665x0.28 smd paste-100 mask+0.051: 1(-2.908,2.25) 2(-2.908,1.75) 3(-2.908,1.25) 4(-2.908,0.75) 5(-2.908,0.25) 6(-2.908,-0.25) 7(-2.908,-0.75) 8(-2.908,-1.25) 9(-2.908,-1.75) 10(-2.908,-2.25) 21(2.908,-2.25) 22(2.908,-1.75) 23(2.908,-1.25) 24(2.908,-0.75) 25(2.908,-0.25) 26(2.908,0.25) 27(2.908,0.75) 28(2.908,1.25) 29(2.908,1.75) 30(2.908,2.25)
  rect 0.28x0.665 smd paste-100 mask+0.051: 11(-2.25,-2.908) 12(-1.75,-2.908) 13(-1.25,-2.908) 14(-0.75,-2.908) 15(-0.25,-2.908) 16(0.25,-2.908) 17(0.75,-2.908) 18(1.25,-2.908) 19(1.75,-2.908) 20(2.25,-2.908) 31(2.25,2.908) 32(1.75,2.908) 33(1.25,2.908) 34(0.75,2.908) 35(0.25,2.908) 36(-0.25,2.908) 37(-0.75,2.908) 38(-1.25,2.908) 39(-1.75,2.908) 40(-2.25,2.908)
  rect 4.42x4.42 smd paste-100 mask+0.051: 41(0,0)
  silkscreen extent -3.52,-3.08 3.08,3.08, body extent -3.01,-3.01 3.01,3.01, height 0.82
87EC0494 [mm]
  rect 1.6x1.6 hole 1: 1(-2.5,0)
  round 1.6 hole 1: 2(2.5,0)
  silkscreen extent -5,-5 5.08,5, body extent -5,-5 5,5, height 13
4032 [mm]
  rect 2.8x3.5 smd: 1(-4.7,0) 2(4.7,0)
  silkscreen extent -5,-4 5,4, body extent -5.1,-4 5.1,4, height 3.5
01550900M [mm]
  rect 4.3x4.24 smd paste+0 mask+0.051: 1(-3.8,0) 2(3.8,0)
  silkscreen extent -5.08,-2.54 5.08,2.54, body extent -4.86,-2.52 4.87,2.52, height 3.81
691322110003 [mm]
  round 2.5 hole 1.4 paste-2539.97 mask+0.051: 1(-3.5,0) 2(0,0) 3(3.5,0)
  silkscreen extent -5.95,-8 5.95,1.27, body extent -5.95,-7.93 5.95,1.27, height 7.3
691322110006 [mm]
  round 2.1 hole 1.4: 1(-8.75,0) 2(-5.25,0) 3(-1.75,0) 4(1.75,0) 5(5.25,0) 6(8.75,0)
  silkscreen extent -11.3,-8.1 11.3,1.3, body extent -11.2,-8 11.2,1.2, height 7.3
691322110007 [mm]
  round 2.1 hole 1.4: 1(-10.5,0) 2(-7,0) 3(-3.5,0) 4(0,0) 5(3.5,0) 6(7,0) 7(10.5,0)
  silkscreen extent -13.05,-8.1 13.05,1.3, body extent -12.95,-8 12.95,1.2, height 7.3
B0503S-2WR3 [mm]
  round 1.8 hole 0.9 paste-2539.97 mask+0.05: 1(-6.35,0) 2(-3.81,0) 4(1.27,0) 6(6.35,0)
  silkscreen extent -8.58,-6.2 11.12,1, body extent -8.45,-6.08 11.15,0.92, height 10
B32921C3104M000 [mm]
  round 2 hole 1: 1(-5,0) 2(5,0)
  silkscreen extent -6.5,-3 6.5,3, body extent -6.5,-3 6.5,3, height 12
Cap-0402 [mil]
  rect 18x25 smd mask+2.36: 1(-18.5,0) 2(18.5,0)
  silkscreen extent -31,-16 31,16, body extent -20,-10 20,10, height 19
Cap-0603 [mil]
  rect 30x35 smd mask+2.36: 1(-30,0) 2(30,0)
  silkscreen extent -49,-21 49,21, body extent -32,-16 31,16, height 34
Cap-0805 [mil] "SMD 0805"
  rect 40x60 smd mask+2.76: 1(-40,0) 2(40,0)
  silkscreen extent -64,-34 64,34, body extent -39,-25 39,25, height 30
Cap-1206 [mil] "SMD 1206"
  rect 60x70 smd: 1(-50,0) 2(50,0)
  silkscreen extent -84,-39 84,39, body extent -63,-31 63,32, height 39
Cap-1210 [mil] "SMD 1210"
  rect 60x110 smd: 1(-50,0) 2(50,0)
  silkscreen extent -84,-59 84,59, body extent -63,-49 63,49, height 39
Ind-0805 [mm] "Inductor 0805"
  rect 1.2x1.32 smd: 1(-1,0) 2(1,0)
  silkscreen extent -0.25,-0.69 0.25,0.69, body extent -1,-0.62 1,0.63, height 0.47
LED-0603 [mm]
  rect 0.5x1 smd: 1(-0.75,0) 2(0.75,0)
  silkscreen extent -1.12,-0.66 1.75,0.66, body extent -0.82,-0.37 0.82,0.36, height 0.68
LMBS-1 [mm]
  rect 1.235x0.84 smd: 1(-2.817,2) 2(2.817,2) 3(2.817,-2) 4(-2.817,-2)
  silkscreen extent -3.76,-2.6 1.97,2.6, body extent -3.1,-2.65 3.1,2.65, height 1.6
MPBH103J3A0701 [mm]
  round 1.8 hole 1: 1(-3.75,0) 2(3.75,0)
  silkscreen extent -5,-2 5,2
RAC05-05SK/480 [mm]
  rect 2.03x2.03 hole 1.35: 1(-22.86,10.16)
  round 2.03 hole 1.35: 2(-22.86,-10.16) 3(22.86,0) 4(22.86,10.16)
  silkscreen extent -27.75,-13.74 26.25,13.66, body extent -26.25,-13.7 26.25,13.7, height 23
Res-0402 [mil]
  rect 18x25 smd mask+2.17: 1(-18.5,0) 2(18.5,0)
  silkscreen extent -32,-17 32,16, body extent -23,-11 23,11, height 16
Res-0603 [mil]
  rect 30x35 smd: 1(-30,0) 2(30,0)
  silkscreen extent -48,-21 48,21, body extent -31,-17 31,17, height 18
Res-1206 [mil]
  rect 60x70 smd: 1(-50,0) 2(50,0)
  silkscreen extent -84,-39 84,39, body extent -63,-31 63,31, height 24
RES-2010 [mm]
  rect 0.9x2.8 smd: 1(-2.35,0) 2(2.35,0)
  silkscreen extent -2.92,-1.52 2.92,1.52, body extent -2.5,-1.25 2.5,1.25, height 0.6
RES-2512 [mm]
  rect 1.6x3.4 smd: 1(-3.25,0) 2(3.25,0)
  silkscreen extent -4.24,-1.85 4.24,1.85, body extent -3.17,-1.63 3.18,1.63, height 0.58
"SFMC-102-X1-XX-D - 570" [mil]
  round 42 hole 28 mask+3: 1(25,-25) 2(25,25) 3(-25,-25) 4(-25,25)
  silkscreen extent -75,-80 75,80, body extent -50,-67 50,68, height 670
"SFMC-104-X1-XX-D - 570" [mil]
  round 42 hole 28 mask+3: 1(75,-25) 2(75,25) 3(25,-25) 4(25,25) 5(-25,-25) 6(-25,25) 7(-75,-25) 8(-75,25)
  silkscreen extent -128,-80 128,80, body extent -100,-66 100,69, height 670
SMD3225-4P [mm]
  rect 1.4x1.2 smd: 1(-1.1,-0.85) 2(1.1,-0.85) 3(1.1,0.85) 4(-1.1,0.85)
  silkscreen extent -2.08,-1.3 1.65,1.3, body extent -1.6,-1.25 1.6,1.25, height 0.81
SOD-123 [mm]
  rect 0.95x0.9 smd: 1(-1.575,0) 2(1.575,0)
  silkscreen extent -1.37,-0.8 2.82,0.8, body extent -1.82,-0.77 1.83,0.78, height 1.5
SOIC-16-300mil [mm]
  rect 1.65x0.6 smd paste+0 mask+0.07: 1(-4.875,4.445) 2(-4.875,3.175) 3(-4.875,1.905) 4(-4.875,0.635) 5(-4.875,-0.635) 6(-4.875,-1.905) 7(-4.875,-3.175) 8(-4.875,-4.445) 9(4.875,-4.445) 10(4.875,-3.175) 11(4.875,-1.905) 12(4.875,-0.635) 13(4.875,0.635) 14(4.875,1.905) 15(4.875,3.175) 16(4.875,4.445)
  silkscreen extent -6,-5.21 3.84,5.21, body extent -5.15,-5.15 5.15,5.15, height 2.65
"Solder Bridge" [mil] "Solder Bridge ON"
  rect 30x35 smd: 1(-30,0) 2(30,0)
  silkscreen extent -50,-22 50,22
SOT-23 [mm] "TRANS NPN 40V 0.6A SOT23"
  rect 0.82x0.92 smd: 1(-0.95,-1) 2(0.95,-1) 3(0,1)
  silkscreen extent -1.68,-1.3 1.55,0.81, body extent -1.5,-1.25 1.5,1.25, height 1.05
SOT-223-6_ [mm]
  rect 0.55x2.15 smd: 1(-2.54,-3.1) 2(-1.27,-3.1) 3(0,-3.1) 4(1.27,-3.1) 5(2.54,-3.1)
  rect 3.5x2.2 smd: 6(0,3.1)
  silkscreen extent -3.33,-4.51 3.33,1.84, body extent -3.28,-3.63 3.27,3.63, height 1.8
Test-point [mil]
  oct 60x60 smd: 1(0,0)
  silkscreen extent -37,-37 37,37
TQ2SA-L2-5V-Z [mm]
  rect 3.3x1.2 smd: 1(-5.08,5.08) 2(-5.08,2.54) 3(-5.08,0) 4(-5.08,-2.54) 5(-5.08,-5.08) 6(5.08,-5.08) 7(5.08,-2.54) 8(5.08,0) 9(5.08,2.54) 10(5.08,5.08)
  silkscreen extent -7.49,-7 4.5,7, body extent -5.75,-7 5.75,7, height 5.6
XRNR6045-470uH/M [mm]
  rect 1.8x5.7 smd: 1(-2.1,0) 2(2.1,0)
  silkscreen extent -1.2,-3 1.2,3, body extent -3.01,-3 3.01,3, height 2.82

## Part data
BR1 BR2: "30A 950mV@400mA 1A 800V LMBS-1 Bridge Rectifiers ROHS", LCSC Part Number=C435904, Manufacturer="MCC(Micro Commercial Components)", Package=LMBS-1, ComponentLink1Description=LCSC, ComponentLink1URL=https://www.lcsc.com/product-detail/Bridge-Rectifiers_MCC-Micro-Commercial-Components-LMB8S-TP_C435904.html?s_z=n_MB8S-TP, Item Type=Bridge, Manufacturer Part Number=LMB8S-TP
C1 C4 C8: library part B32921C3104M000, "CAP FILM 0.1UF 20% 630VDC RADIAL", Case/Package=Radial, Dielectric=PP, Dielectric Material=Polypropylene, Insulation Resistance=100R, LCSC Part Number=C361368, Manufacturer="TDK EPCOS", Max Operating Temperature=110°C, Min Operating Temperature=-40°C, Ratings=X2, Tolerance=20%, Voltage=630V, Voltage Rating (AC)=305V, ComponentLink1Description=https://datasheet.ciiva.com/48779/1833206-48779695.pdf?src-supplier=Element14, ComponentLink1URL=https://datasheet.ciiva.com/48779/1833206-48779695.pdf?src-supplier=Element14, Depth=6mm, Dissipation Factor=1%, Height=12mm, Item Type="Film Capacitors", Lead Diameter=0.6mm, Lead Length=6mm, Lead Pitch=10mm, Length=13mm, Manufacturer Part Number=B32921C3104M000, Mounting Technology="Through Hole", Pins=2NUMBER, Pricing="100=1.997, 250=1.855, 500=1.75, 1000=1.571 (DKK)", Reach SVHC Compliant=No, RoHS=Yes, RoHS Compliant=Yes, Series=B32921, Stock=6670, Supplier=Rs, Termination="PC Pins", Voltage Rating (DC)=630V
C2 C7: library part 87EC0494, "33uF 420V 1Ω@100kHz 430mA@100kHz ±20% Plugin,D10xL16mm Aluminum Electrolytic Capacitors - Leaded ROHS", LCSC Part Number=C6718366, Manufacturer=KNSCHA, Package=Plugin,D10xL16mm, ComponentLink1Description=LCSC, ComponentLink1URL=https://www.lcsc.com/product-detail/Aluminum-Electrolytic-Capacitors-Leaded_KNSCHA-87EC0494_C6718366.html, Item Type=Capacitor, Manufacturer Part Number=87EC0494
C3: library part MPBH103J3A0701, "10nF -40℃~+100℃ ±5% 1kV Through Hole,P=7.5mm Film Capacitors RoHS", LCSC Part Number=C2928848, Manufacturer=KYET, Package="Through Hole,P=7.5mm", ComponentLink1Description=LCSC, ComponentLink1URL=https://www.lcsc.com/product-detail/C2928848.html, Item Type=Capacitor, Manufacturer Part Number=MPBH103J3A0701
C5: library part CL21B104KBCNNNC, "Multilayer Ceramic Capacitor, 0.1 uF, 50 V, ± 10%, X7R, 0805 [2012 Metric]", Case Code (Imperial)=0805, Case Code (Metric)=2012, Dielectric=X7R, Manufacturer=Samsung, Max Operating Temperature=125°C, Min Operating Temperature=-55°C, Supplier Part Number=1276-1003-1-ND, Tolerance=10%, Voltage=50V, Case/Package=0805, Category="Ceramic Capacitors", ComponentLink1Description=https://datasheet.ciiva.com/25710/cl21b104kbcnnnc-25710182.pdf?src-supplier=Digikey, ComponentLink1URL=https://datasheet.ciiva.com/25710/cl21b104kbcnnnc-25710182.pdf?src-supplier=Digikey, ComponentLink2Description=https://datasheet.ciiva.com/29199/454152-da-01-en-vs-kondensator-0805-29199814.pdf?src-supplier=Conrad, ComponentLink2URL=https://datasheet.ciiva.com/29199/454152-da-01-en-vs-kondensator-0805-29199814.pdf?src-supplier=Conrad, Construction=Flat, Depth=1.25mm, Height=0.85mm, Item Type=Capacitor, Lead Free=5697LeadFree, Length=2mm, Manufacturer Part Number=CL21B104KBCNNNC, Material=Ceramic, Mounting Technology="Surface Mount", Packaging="Tape and Reel", Pricing="1=0.1, 10=0.042, 50=0.024, 100=0.0186, 500=0.01404, 1000=0.01103 (USD)", Radiation Hardening=No, RoHS=Yes, RoHS Compliant=Yes, Series=CL, Stock=2193973, Supplier=Digikey, Thickness=0.037inch, Voltage Rating=50V, Voltage Rating (DC)=50V, Width=0.049inch
C6: library part CC1210KKX7R9BB106, "CAP CER 10UF 50V X7R 1210", Case Code (Imperial)=1210, Case Code (Metric)=3225, Dielectric=X7R, LCSC Part Number=C596319, Manufacturer=Yageo, Max Operating Temperature=125°C, Min Operating Temperature=-55°C, Tolerance=10%, Voltage Rating=50V, Case/Package=1210, ComponentLink1Description=https://datasheet.octopart.com/CC1210KKX7R9BB106-Yageo-datasheet-147453679.pdf?src-supplier=Newark, ComponentLink1URL=https://datasheet.octopart.com/CC1210KKX7R9BB106-Yageo-datasheet-147453679.pdf?src-supplier=Newark, ComponentLink2Description=https://datasheet.octopart.com/CC1210KKX7R9BB106-Yageo-datasheet-166511530.pdf?src-supplier=Future+Electronics, ComponentLink2URL=https://datasheet.octopart.com/CC1210KKX7R9BB106-Yageo-datasheet-166511530.pdf?src-supplier=Future+Electronics, ComponentLink3Description=http://www.yageo.com/documents/recent/UPY-GPHC_X7R_6.3V-to-50V_18.pdf?src-supplier=Digikey, ComponentLink3URL=http://www.yageo.com/documents/recent/UPY-GPHC_X7R_6.3V-to-50V_18.pdf?src-supplier=Digikey, ComponentLink4Description=http://www.yageo.com/exep/pages/download/literatures/ProductSelectionGuide%202014_Final_2.pdf?src-supplier=Digikey, ComponentLink4URL=http://www.yageo.com/exep/pages/download/literatures/ProductSelectionGuide%202014_Final_2.pdf?src-supplier=Digikey, ComponentLink5Description=https://datasheet.octopart.com/CC1210KKX7R9BB106-Yageo-datasheet-151948686.pdf?src-supplier=Farnell, ComponentLink5URL=https://datasheet.octopart.com/CC1210KKX7R9BB106-Yageo-datasheet-151948686.pdf?src-supplier=Farnell, Halogen Free="Halogen Free", Item Type=Capacitors, Lead Free="Lead Free", Length=0.126inch, Manufacturer Part Number=CC1210KKX7R9BB106, Mounting Technology="Surface Mount", Packaging="Cut Tape", RoHS=Yes, RoHS Compliant=Yes, Series=CC, Stock=76, Supplier=Farnell, Thickness=0.11inch, Voltage Rating (DC)=50V, Width=0.098inch
C9 C13: library part CC0603JRX7R8BB104, "CAP CER 0.1UF 25V X7R 0603", Case Code (Imperial)=0603, Case Code (Metric)=1608, Dielectric=X7R, LCSC Part Number=C327087, Manufacturer=Yageo, Max Operating Temperature=125°C, Min Operating Temperature=-55°C, Tolerance=5%, Voltage Rating=25V, Case/Package=0603, ComponentLink1Description=https://datasheet.ciiva.com/11465/upy-gphc-x7r-6-3v-to-50v-8-11465031.pdf?src-supplier=Avnet, ComponentLink1URL=https://datasheet.ciiva.com/11465/upy-gphc-x7r-6-3v-to-50v-8-11465031.pdf?src-supplier=Avnet, Construction=Flat, Halogen Free="Halogen Free", Height=0.8mm, Item Type=Capacitors, Lead Free="Lead Free", Length=1.6mm, Manufacturer Part Number=CC0603JRX7R8BB104, Mounting Technology="Surface Mount", Packaging="Tape and Reel", Pricing="1=0.1, 10=0.057, 50=0.039, 100=0.0335, 500=0.02436, 1000=0.0215 (USD)", RoHS=Yes, RoHS Compliant=Yes, Series=CC, Stock=448767, Supplier=Digikey, Termination=SMD/SMT, Thickness=0.035inch, Voltage Rating (DC)=25V, Weight=7.1E-05oz, Width=0.031inch
C10 C11 C12: library part CC0603KRX5R7BB475, "CAP CER 4.7UF 16V X5R 0603", Case Code (Imperial)=0603, Case Code (Metric)=1608, Dielectric=X5R, LCSC Part Number=C277476, Manufacturer=Yageo, Max Operating Temperature=85°C, Min Operating Temperature=-55°C, Resistor Type=Ceramic, Supplier Part Number 1=311-1785-1-ND, Tolerance=10%, Voltage Rating=16V, Capacitance=4.7uF, Case/Package=0603, Category="Ceramic Capacitors", ComponentLink1Description=http://www.mouser.com/ds/2/447/UPY-GPHC_X5R_4V-to-50V_25-1131599.pdf?src-supplier=Mouser, ComponentLink1URL=http://www.mouser.com/ds/2/447/UPY-GPHC_X5R_4V-to-50V_25-1131599.pdf?src-supplier=Mouser, ComponentLink2Description=http://www.yageo.com/documents/recent/UPY-GPHC_X5R_4V-to-50V_25.pdf?src-supplier=Digi-Key, ComponentLink2URL=http://www.yageo.com/documents/recent/UPY-GPHC_X5R_4V-to-50V_25.pdf?src-supplier=Digi-Key, Depth=0.8mm, Halogen Free="Halogen Free", Height=0.8mm, Item Type=Capacitor, Lead Free="Lead Free", Length=1.6mm, Manufacturer Part Number=CC0603KRX5R7BB475, Mount="Surface Mount", Packaging="Tape and Reel", Pricing 1="1=0.20000, 10=0.13800, 50=0.08280, 100=0.06990, 500=0.04784, 1000=0.04233 (USD)", RoHS=Yes, RoHS Compliant=Yes, Series=CC, Stock 1=547703, Supplier 1=Digi-Key, Termination=SMD/SMT, Thickness=0.037inch, Voltage Rating (DC)=16V, Weight=7.1E-05oz, Width=0.8mm
C14: library part GRM1885C1H103JA01D, "CAP CER 10000PF 50V C0G/NP0 0603", Capacitance=10nF, Case Code (Imperial)=0603, Case Code (Metric)=1608, Dielectric=C0G, Manufacturer=Murata, Max Operating Temperature=125°C, Min Operating Temperature=-55°C, Package Quantity=4000, Supplier Part Number 1=1449032, Tolerance=5%, Voltage=50V, Case/Package=0603, Category="Ceramic Capacitors", ComponentLink1Description=https://datasheet.ciiva.com/41860/partnumbering-e-01-41860759.pdf?src-supplier=Digi-Key, ComponentLink1URL=https://datasheet.ciiva.com/41860/partnumbering-e-01-41860759.pdf?src-supplier=Digi-Key, ComponentLink2Description=https://datasheet.ciiva.com/29537/partnumbering-e-01-29537910.pdf?src-supplier=Digi-Key, ComponentLink2URL=https://datasheet.ciiva.com/29537/partnumbering-e-01-29537910.pdf?src-supplier=Digi-Key, Depth=0.8mm, Height=0.8mm, Lead Free="Lead Free", Lead Pitch=0.5mm, Length=1.6mm, Manufacturer Part Number=GRM1885C1H103JA01D, Material=Ceramic, Mount="Surface Mount", Packaging="Tape and Reel", Pricing 1="4000=0.03500, 8000=0.03200 (GBP)", REACH SVHC="No SVHC", RoHS=Yes, RoHS Compliant=Yes, Series=GRM, Stock 1=80000, Supplier 1=RSComponents, Termination=SMD/SMT, Thickness=0.035inch, Voltage Rating=50V, Voltage Rating (DC)=50V, Width=0.8mm
C15 C16 C30 C31: library part GCJ188R71H104KA12D, "CAP CER 0.1UF 50V X7R 0603", Case Code (Imperial)=0603, Case Code (Metric)=1608, Dielectric=X7R, LCSC Part Number=C161115, Manufacturer=Murata, Max Operating Temperature=125°C, Min Operating Temperature=-55°C, Package Quantity=1, Ratings=AEC-Q200, Tolerance=10%, Voltage Rating=50V, Case/Package=0603, ComponentLink1Description=https://datasheet.ciiva.com/135/product-135604.pdf?src-supplier=Digikey, ComponentLink1URL=https://datasheet.ciiva.com/135/product-135604.pdf?src-supplier=Digikey, ComponentLink2Description=https://datasheet.ciiva.com/26889/getdatasheetpartid-369886-26889118.pdf?src-supplier=Verical, ComponentLink2URL=https://datasheet.ciiva.com/26889/getdatasheetpartid-369886-26889118.pdf?src-supplier=Verical, ComponentLink3Description=https://datasheet.ciiva.com/135/s0717e-135605.pdf?src-supplier=Digikey, ComponentLink3URL=https://datasheet.ciiva.com/135/s0717e-135605.pdf?src-supplier=Digikey, ComponentLink4Description=https://datasheet.ciiva.com/135/s0717e-135606.pdf?src-supplier=Digikey, ComponentLink4URL=https://datasheet.ciiva.com/135/s0717e-135606.pdf?src-supplier=Digikey, ComponentLink5Description=https://datasheet.ciiva.com/16440/c03e-16440425.pdf?src-supplier=Future+Electronics, ComponentLink5URL=https://datasheet.ciiva.com/16440/c03e-16440425.pdf?src-supplier=Future+Electronics, Construction=Flat, Depth=0.8mm, Features="Soft Termination", Height=0.8mm, Item Type=Capacitors, Lead Free=5697LeadFree, Length=1.6mm, Manufacturer Part Number=GCJ188R71H104KA12D, Material=4241ConductorMaterial, Mounting Technology="Surface Mount", Packaging="Tape and Reel", Pricing="1=0.13, 10=0.056, 50=0.056, 100=0.036, 1000=0.032, 10000=0.02 (USD)", Radiation Hardening=No, RoHS=Yes, RoHS Compliant=Yes, Series=GCJ, Stock=342536, Supplier=Mouser, Termination=SMD/SMT, Thickness=0.035inch, Voltage Rating (DC)=50V, Width=0.031inch
C21: library part C1005X5R1V105K050BC, "CAP CER 1UF 35V X5R 0402", Case Code (Imperial)=0402, Case Code (Metric)=1005, Dielectric=X5R, Dielectric Material=Ceramic, Manufacturer=TDK, Max Operating Temperature=85°C, Min Operating Temperature=-55°C, Supplier Part Number=445-9073-1-ND, Tolerance=10%, Voltage Rating=35V, Case/Package=0402, ComponentLink1Description=https://datasheet.ciiva.com/26834/getdatasheetpartid-750449-26834298.pdf?src-supplier=Verical, ComponentLink1URL=https://datasheet.ciiva.com/26834/getdatasheetpartid-750449-26834298.pdf?src-supplier=Verical, ComponentLink2Description=https://datasheet.ciiva.com/28451/1796654-28451087.pdf?src-supplier=Element14, ComponentLink2URL=https://datasheet.ciiva.com/28451/1796654-28451087.pdf?src-supplier=Element14, ComponentLink3Description=https://datasheet.ciiva.com/22719/1796654-22719533.pdf?src-supplier=Element14, ComponentLink3URL=https://datasheet.ciiva.com/22719/1796654-22719533.pdf?src-supplier=Element14, Depth=0.5mm, Item Type=Capacitors, Lead Free="Lead Free", Length=1mm, Manufacturer Part Number=C1005X5R1V105K050BC, Material=4241ConductorMaterial, Mounting Technology="Surface Mount", Packaging="Tape and Reel", Pricing="1=0.15, 10=0.087, 50=0.061, 100=0.0528, 500=0.03898, 1000=0.03468, 2500=0.03011, 5000=0.02735 (USD)", Radiation Hardening=No, Reach SVHC Compliant=No, RoHS=Yes, RoHS Compliant=Yes, Series=C, Stock=682645, Supplier=Digikey
C28 C29: library part CC0603JRNPO9BN150, "CAP CER 15PF 50V C0G/NPO 0603", Case Code (Imperial)=0603, Case Code (Metric)=1608, Dielectric=C0G, Dielectric Material=Ceramic, Insulation Resistance=100GR, LCSC Part Number=C107037, Manufacturer=Yageo, Max Operating Temperature=125°C, Min Operating Temperature=-55°C, Package Quantity=1, Supplier Part Number 1=4234670, Tolerance=5%, Voltage Rating=50V, Case/Package=0603, Category="Ceramic Capacitors", ComponentLink1Description=https://datasheet.ciiva.com/144/mlccorderingcode-144635.pdf?src-supplier=Digi-Key, ComponentLink1URL=https://datasheet.ciiva.com/144/mlccorderingcode-144635.pdf?src-supplier=Digi-Key, ComponentLink2Description=https://datasheet.ciiva.com/144/mlccorderingcode-144636.pdf?src-supplier=Digi-Key, ComponentLink2URL=https://datasheet.ciiva.com/144/mlccorderingcode-144636.pdf?src-supplier=Digi-Key, ComponentLink3Description=https://datasheet.ciiva.com/8033/1443161-8033721.pdf?src-supplier=Element14, ComponentLink3URL=https://datasheet.ciiva.com/8033/1443161-8033721.pdf?src-supplier=Element14, ComponentLink4Description=https://datasheet.ciiva.com/28450/1443161-28450472.pdf?src-supplier=Element14, ComponentLink4URL=https://datasheet.ciiva.com/28450/1443161-28450472.pdf?src-supplier=Element14, ComponentLink5Description=https://datasheet.ciiva.com/144/mlccorderingcode-144634.pdf?src-supplier=Digi-Key, ComponentLink5URL=https://datasheet.ciiva.com/144/mlccorderingcode-144634.pdf?src-supplier=Digi-Key, ComponentLink6Description=https://datasheet.ciiva.com/8033/1734582-8033723.pdf?src-supplier=Element14, ComponentLink6URL=https://datasheet.ciiva.com/8033/1734582-8033723.pdf?src-supplier=Element14, ComponentLink7Description=https://datasheet.ciiva.com/8033/1734582-8033722.pdf?src-supplier=Element14, ComponentLink7URL=https://datasheet.ciiva.com/8033/1734582-8033722.pdf?src-supplier=Element14, ComponentLink8Description=https://datasheet.ciiva.com/11464/upy-gp-np0-16v-to-50v-8-11464727.pdf?src-supplier=Avnet, ComponentLink8URL=https://datasheet.ciiva.com/11464/upy-gp-np0-16v-to-50v-8-11464727.pdf?src-supplier=Avnet, Depth=0.8mm, Height=0.8mm, Item Type=Capacitor, Lead Free="Lead Free", Length=1.6mm, Manufacturer Part Number=CC0603JRNPO9BN150, Mounting Technology="Surface Mount", Packaging="Tape and Reel", Pins=2, Pricing 1="4000=0.0038, 16000=0.0036, 80000=0.0034, 160000=0.0033, 500000=0.0031 (USD)", Radiation Hardening=No, Reach SVHC Compliant=No, RoHS=Yes, RoHS Compliant=Yes, Series=CC, Stock 1=832000, Supplier 1="Future Electronics", Termination=SMD/SMT, Thickness=0.035inch, Width=0.031inch
C32 C34 C36 C38: library part CC0402KRX5R8BB104, "CAP CER 0.1UF 25V X5R 0402", Case Code (Imperial)=0402, Case Code (Metric)=1005, Dielectric=X5R, LCSC Part Number=C106256, Manufacturer=Yageo, Max Operating Temperature=85°C, Min Operating Temperature=-55°C, Resistor Type=Ceramic, Supplier Part Number 1=311-1697-1-ND, Tolerance=10%, Voltage Rating=25V, Capacitance=100nF, Case/Package=0402, Category="Ceramic Capacitors", ComponentLink1Description=http://www.mouser.com/ds/2/447/UPY-GPHC_X5R_4V-to-50V_25-1131599.pdf?src-supplier=Mouser, ComponentLink1URL=http://www.mouser.com/ds/2/447/UPY-GPHC_X5R_4V-to-50V_25-1131599.pdf?src-supplier=Mouser, ComponentLink2Description=http://www.yageo.com/documents/recent/UPY-GPHC_X5R_4V-to-50V-16.pdf?src-supplier=Future+Electronics, ComponentLink2URL=http://www.yageo.com/documents/recent/UPY-GPHC_X5R_4V-to-50V-16.pdf?src-supplier=Future+Electronics, ComponentLink3Description=http://www.yageo.com/documents/recent/UPY-GPHC_X5R_4V-to-50V_25.pdf?src-supplier=Digi-Key, ComponentLink3URL=http://www.yageo.com/documents/recent/UPY-GPHC_X5R_4V-to-50V_25.pdf?src-supplier=Digi-Key, Depth=0.5mm, Halogen Free="Halogen Free", Item Type=Capacitor, Lead Free="Lead Free", Length=0.039inch, Manufacturer Part Number=CC0402KRX5R8BB104, Mount="Surface Mount", Packaging="Tape and Reel", Pricing 1="1=0.10000, 10=0.03800, 50=0.02100, 100=0.01710, 500=0.01224, 1000=0.00961, 2500=0.00874, 5000=0.00804 (USD)", RoHS=Yes, RoHS Compliant=Yes, Series=CC, Stock 1=4598218, Supplier 1=Digi-Key, Thickness=0.022inch, Voltage Rating (DC)=25V, Width=0.02inch
C33 C35 C37 C39: library part CL05A475MO5NUNC, "CAP CER 4.7UF 16V X5R 0402", Case Code (Imperial)=0402, Case Code (Metric)=1005, Manufacturer=Samsung, Max Operating Temperature=85°C, Min Operating Temperature=-55°C, Tolerance=20%, Voltage Rating=16V, Capacitance=4.7uF, Case/Package=0402, Category="Ceramic Capacitors", ComponentLink1Description=http://www.farnell.com/datasheets/2710653.pdf?src-supplier=Farnell, ComponentLink1URL=http://www.farnell.com/datasheets/2710653.pdf?src-supplier=Farnell, ComponentLink2Description=http://www.samsungsem.com/kr/support/product-search/mlcc/CL05A475MO5NUNC.jsp?src-supplier=Digikey, ComponentLink2URL=http://www.samsungsem.com/kr/support/product-search/mlcc/CL05A475MO5NUNC.jsp?src-supplier=Digikey, ComponentLink3Description=http://www.farnell.com/datasheets/2710653.pdf?src-supplier=Element14, ComponentLink3URL=http://www.farnell.com/datasheets/2710653.pdf?src-supplier=Element14, ComponentLink4Description=https://datasheet.octopart.com/CL05A475MO5NUNC-Samsung-Electro-Mechanics-datasheet-123102911.pdf?src-supplier=Future+Electronics, ComponentLink4URL=https://datasheet.octopart.com/CL05A475MO5NUNC-Samsung-Electro-Mechanics-datasheet-123102911.pdf?src-supplier=Future+Electronics, ComponentLink5Description=http://www.farnell.com/datasheets/2710653.pdf?src-supplier=Newark, ComponentLink5URL=http://www.farnell.com/datasheets/2710653.pdf?src-supplier=Newark, Height=550um, Length=0.039inch, Manufacturer Part Number=CL05A475MO5NUNC, Material=4241ConductorMaterial, Mount="Surface Mount", Packaging="Cut Tape", Pricing 1="10000=0.09712 (USD)", RoHS=Yes, RoHS Compliant=Yes, Series=CL, Stock 1=50000, Supplier 1=Avnet, Supplier Part Number 1=CL05A475MO5NUNC, Thickness=0.022inch, Voltage Rating (DC)=16V, Width=0.02inch
C40 C43 C46 C51 C56 C57: library part CC1206KKX7RBBB223, "CAP CER 0.022UF 500V X7R 1206", LCSC Part Number=C326702, Manufacturer=Yageo, ComponentLink1Description=http://www.mouser.com/ds/2/447/Yageo_UPY-GP_NP0_16V-to-50V_9-358835.pdf?src-supplier=Mouser, ComponentLink1URL=http://www.mouser.com/ds/2/447/Yageo_UPY-GP_NP0_16V-to-50V_9-358835.pdf?src-supplier=Mouser, ComponentLink2Description=http://www.yageo.com/documents/recent/UPY-NP0X7R_MV_100-to-630V_9.pdf?src-supplier=Avnet, ComponentLink2URL=http://www.yageo.com/documents/recent/UPY-NP0X7R_MV_100-to-630V_9.pdf?src-supplier=Avnet, ComponentLink3Description=http://www.yageo.com/documents/recent/UPY-NP0X7R_MV_100-to-630V_19.pdf?src-supplier=Digikey, ComponentLink3URL=http://www.yageo.com/documents/recent/UPY-NP0X7R_MV_100-to-630V_19.pdf?src-supplier=Digikey, ComponentLink4Description=http://www.yageo.com/documents/recent/UPY-NP0X7R_MV_100-to-630V_21.pdf?src-supplier=Digikey, ComponentLink4URL=http://www.yageo.com/documents/recent/UPY-NP0X7R_MV_100-to-630V_21.pdf?src-supplier=Digikey, ComponentLink5Description=https://www.yageo.com/upload/media/product/products/datasheet/mlcc/UPY-NP0X7R_MV_100-to-630V_21.pdf?src-supplier=Digikey, ComponentLink5URL=https://www.yageo.com/upload/media/product/products/datasheet/mlcc/UPY-NP0X7R_MV_100-to-630V_21.pdf?src-supplier=Digikey, ComponentLink6Description=http://www.yageo.com/documents/recent/UPY-NP0X7R_MV_100-to-630V_9.pdf?src-supplier=Future+Electronics, ComponentLink6URL=http://www.yageo.com/documents/recent/UPY-NP0X7R_MV_100-to-630V_9.pdf?src-supplier=Future+Electronics, ComponentLink7Description=https://datasheet.octopart.com/CC1206KKX7RBBB223-Yageo-datasheet-10979222.pdf?src-supplier=Future+Electronics, ComponentLink7URL=https://datasheet.octopart.com/CC1206KKX7RBBB223-Yageo-datasheet-10979222.pdf?src-supplier=Future+Electronics, Item Type=Capacitors, Lead Free=5697LeadFree, Manufacturer Part Number=CC1206KKX7RBBB223, Pricing="3000=0.0421, 6000=0.0414, 12000=0.0407, 15000=0.0405, 45000=0.0392 (USD)", RoHS=Yes, Stock=660000, Supplier="Future Electronics"
C41 C42 C44 C45 C47 C48 C49 C50 C52 C53 C54 C55: library part CC0603KRX7R9BB223, "CAP CER 0.022UF 50V X7R 0603", Case Code (Imperial)=0603, Case Code (Metric)=1608, Dielectric=X7R, Dielectric Material=Ceramic, Insulation Resistance=100GR, LCSC Part Number=C106222, Manufacturer=Yageo, Max Operating Temperature=125°C, Min Operating Temperature=-55°C, Package Quantity=1, Supplier Part Number 1=311-1370-1-ND, Tolerance=10%, Voltage=50V, Capacitance=22nF, Case/Package=0603, Category="Ceramic Capacitors", ComponentLink1Description=https://datasheet.ciiva.com/8033/70765-8033869.pdf?src-supplier=Element14, ComponentLink1URL=https://datasheet.ciiva.com/8033/70765-8033869.pdf?src-supplier=Element14, ComponentLink2Description=https://datasheet.ciiva.com/28450/1489800-28450639.pdf?src-supplier=Element14, ComponentLink2URL=https://datasheet.ciiva.com/28450/1489800-28450639.pdf?src-supplier=Element14, ComponentLink3Description=https://datasheet.ciiva.com/8033/1489800-8033867.pdf?src-supplier=Element14, ComponentLink3URL=https://datasheet.ciiva.com/8033/1489800-8033867.pdf?src-supplier=Element14, ComponentLink4Description=https://datasheet.ciiva.com/8033/1489800-8033865.pdf?src-supplier=Element14, ComponentLink4URL=https://datasheet.ciiva.com/8033/1489800-8033865.pdf?src-supplier=Element14, ComponentLink5Description=https://datasheet.ciiva.com/156/mlccorderingcode-156178.pdf?src-supplier=Digi-Key, ComponentLink5URL=https://datasheet.ciiva.com/156/mlccorderingcode-156178.pdf?src-supplier=Digi-Key, ComponentLink6Description=https://datasheet.ciiva.com/156/mlccorderingcode-156177.pdf?src-supplier=Digi-Key, ComponentLink6URL=https://datasheet.ciiva.com/156/mlccorderingcode-156177.pdf?src-supplier=Digi-Key, ComponentLink7Description=https://datasheet.ciiva.com/156/mlccorderingcode-156179.pdf?src-supplier=Digi-Key, ComponentLink7URL=https://datasheet.ciiva.com/156/mlccorderingcode-156179.pdf?src-supplier=Digi-Key, ComponentLink8Description=https://datasheet.ciiva.com/11464/upy-gphc-x7r-6-3v-to-50v-8-11464741.pdf?src-supplier=Avnet, ComponentLink8URL=https://datasheet.ciiva.com/11464/upy-gphc-x7r-6-3v-to-50v-8-11464741.pdf?src-supplier=Avnet, Depth=0.8mm, Halogen Free="Halogen Free", Height=0.8mm, Item Type=Capacitor, Lead Free="Lead Free", Length=1.6mm, Manufacturer Part Number=CC0603KRX7R9BB223, Mount="Surface Mount", Number of Pins=2, Packaging="Tape and Reel", Pricing 1="1=0.10000, 10=0.05500, 50=0.03020, 100=0.02460, 500=0.01760, 1000=0.01383 (USD)", Radiation Hardening=No, REACH SVHC="No SVHC", Resistor Type=Ceramic, RoHS=Yes, RoHS Compliant=Yes, Series=CC, Stock 1=119735, Supplier 1=Digi-Key, Termination=SMD/SMT, Thickness=0.035inch, Voltage Rating=50V, Voltage Rating (DC)=50V, Width=0.031inch
C62: library part GRM188Z71A106KA73D, "CAP CER 10UF 10V X7R 0603", Case/Package=345Case, LCSC Part Number=C2959727, Manufacturer=Murata, Max Operating Temperature=125°C, Min Operating Temperature=-55°C, Tolerance=10%, Voltage Rating=10V, ComponentLink1Description=https://datasheet.octopart.com/GRM188Z71A106KA73D-Murata-datasheet-165579666.pdf?src-supplier=TME, ComponentLink1URL=https://datasheet.octopart.com/GRM188Z71A106KA73D-Murata-datasheet-165579666.pdf?src-supplier=TME, Height=1mm, Item Type=Capacitor, Length=1.6mm, Manufacturer Part Number=GRM188Z71A106KA73D, Material=4241ConductorMaterial, Pricing="1=0.36, 10=0.155, 50=0.155, 100=0.104, 1000=0.094, 10000=0.065 (USD)", RoHS=Yes, RoHS Compliant=Yes, Stock=390983, Supplier=Mouser, Thickness=800um, Width=800um